# Altium PCB RTL8316_STAND.PcbDoc (part 1 of 4)
Units mm, origin at the board's own origin, x right, y up, seen from the top; angles counter-clockwise.
Board outline 155 x 217 mm, 4 copper layers (Top, Ground, Power, Bottom), stack 1.012 mm thick; 305 components, 396 nets, 1247 pads, 345 vias.
Unrouted connection lines stored in the file: 59.
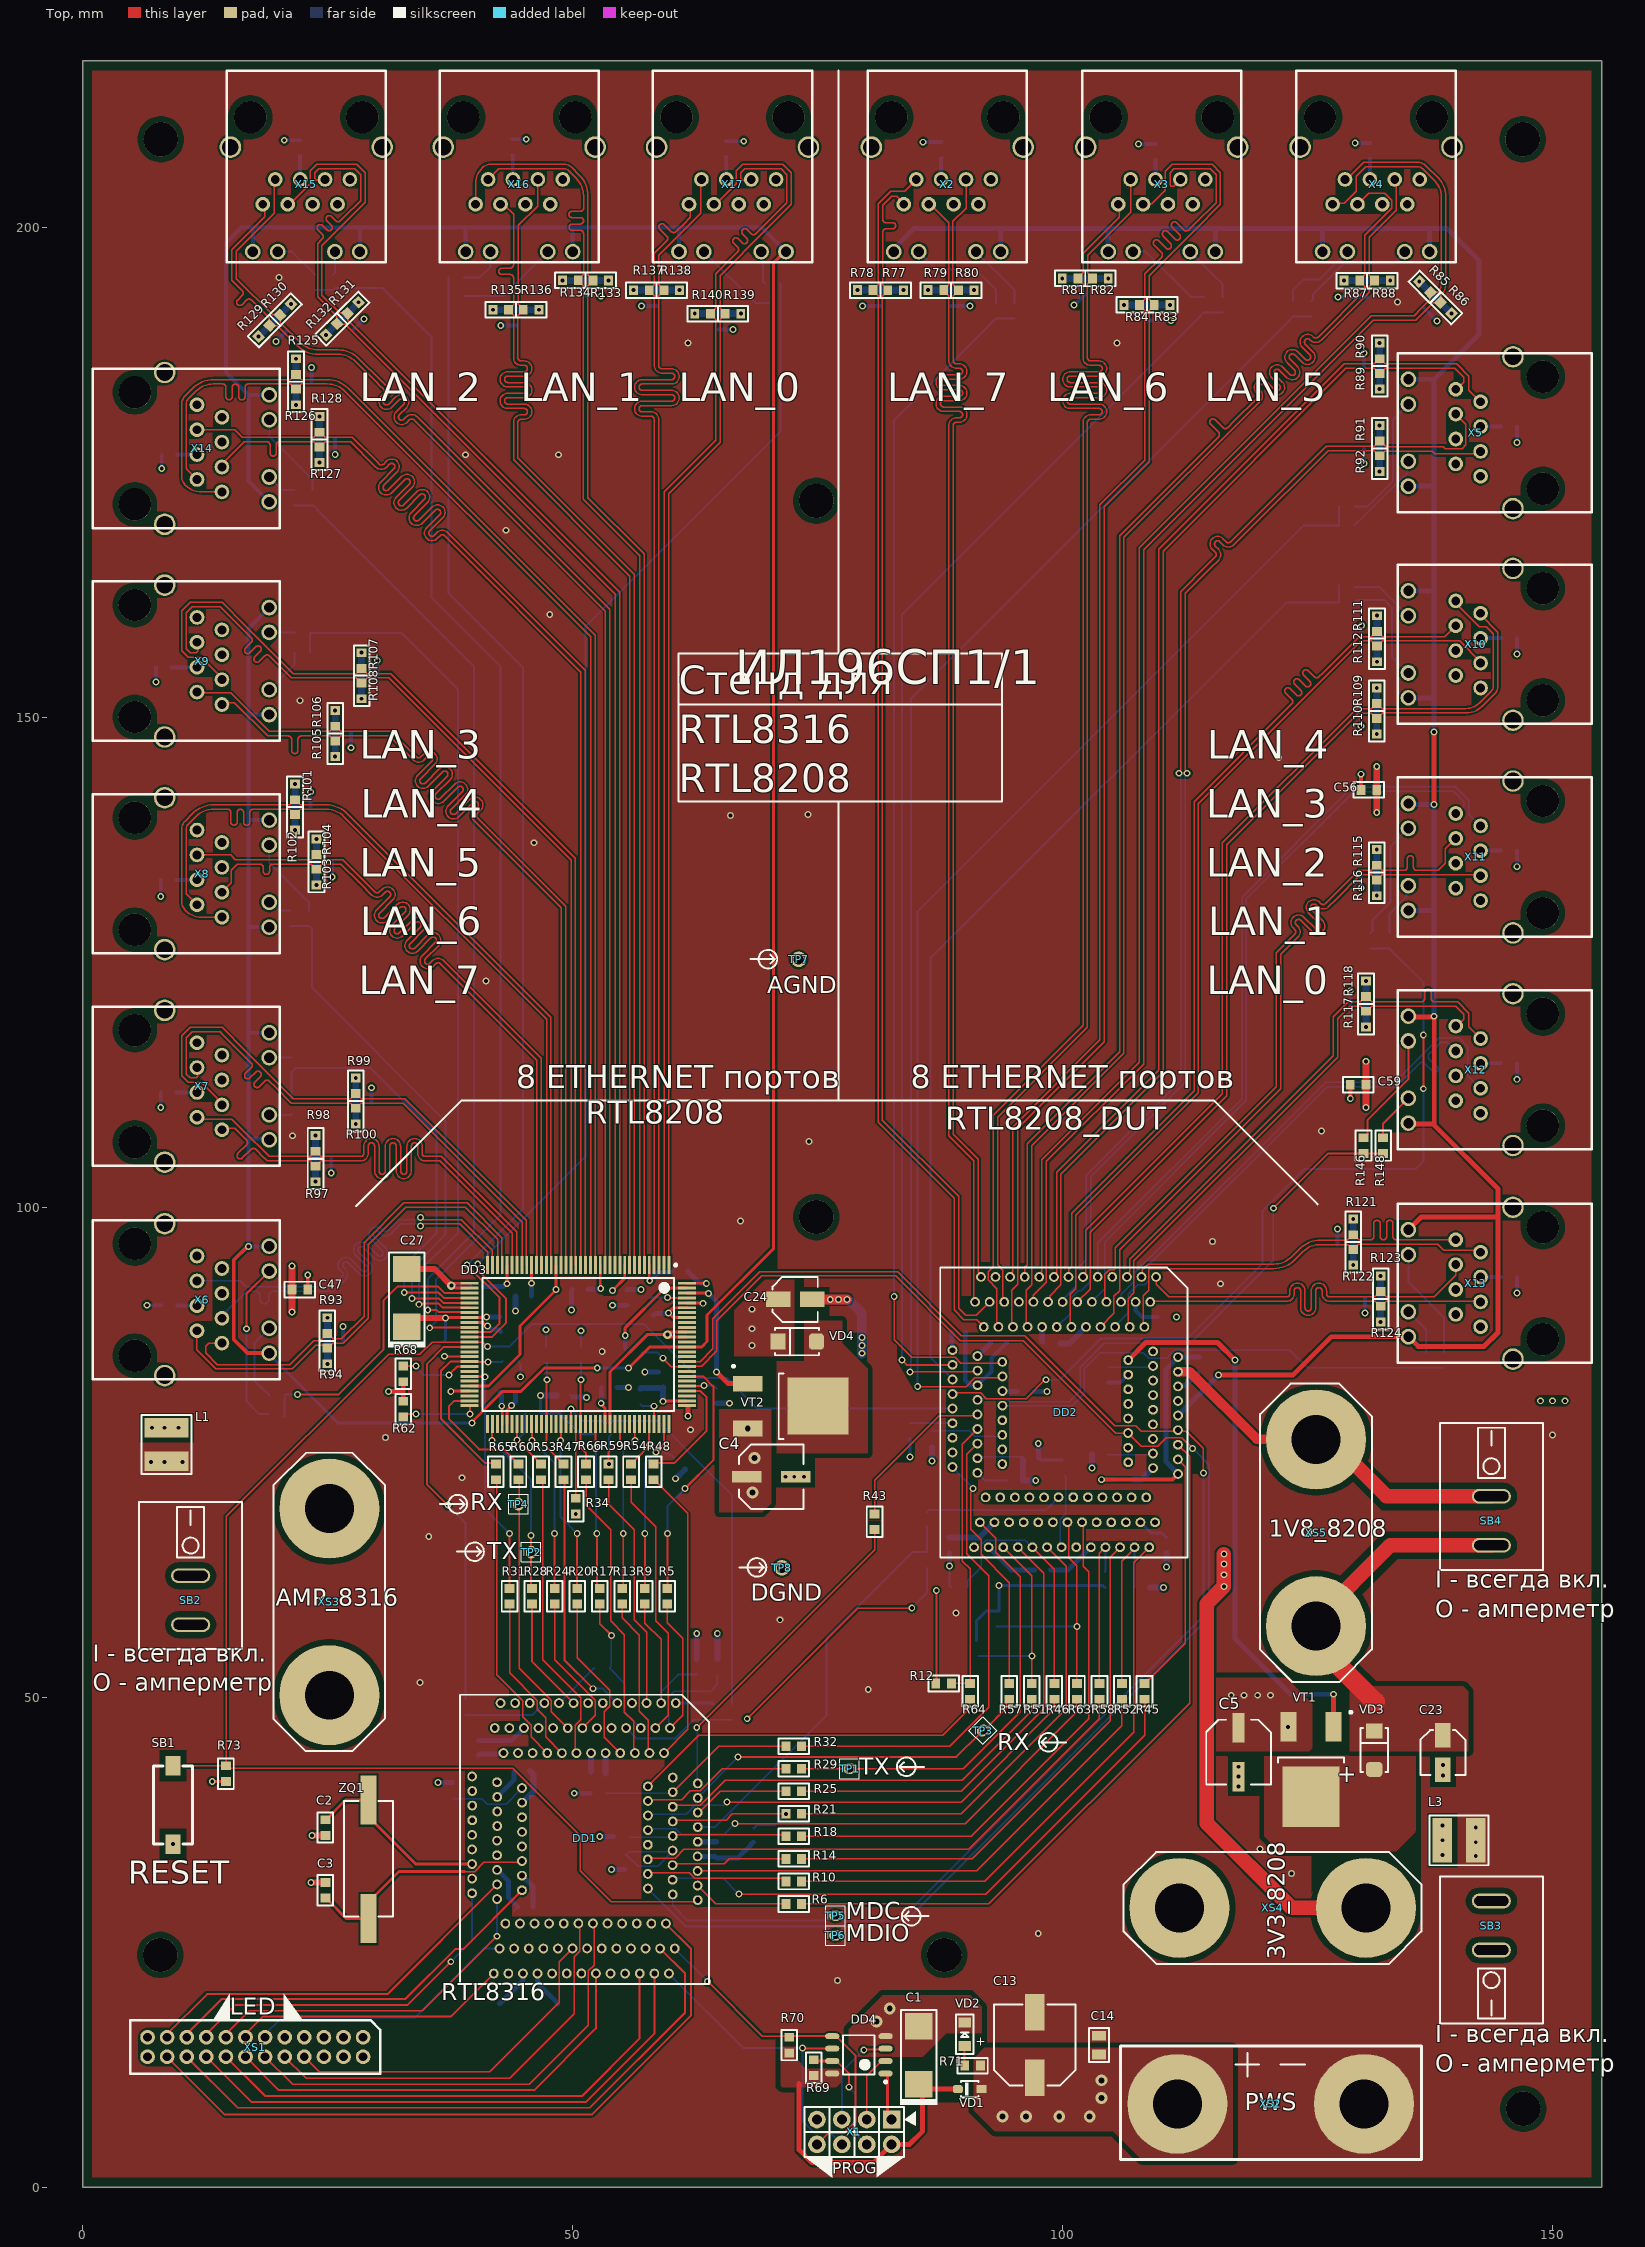
[diagram p0: Top view]
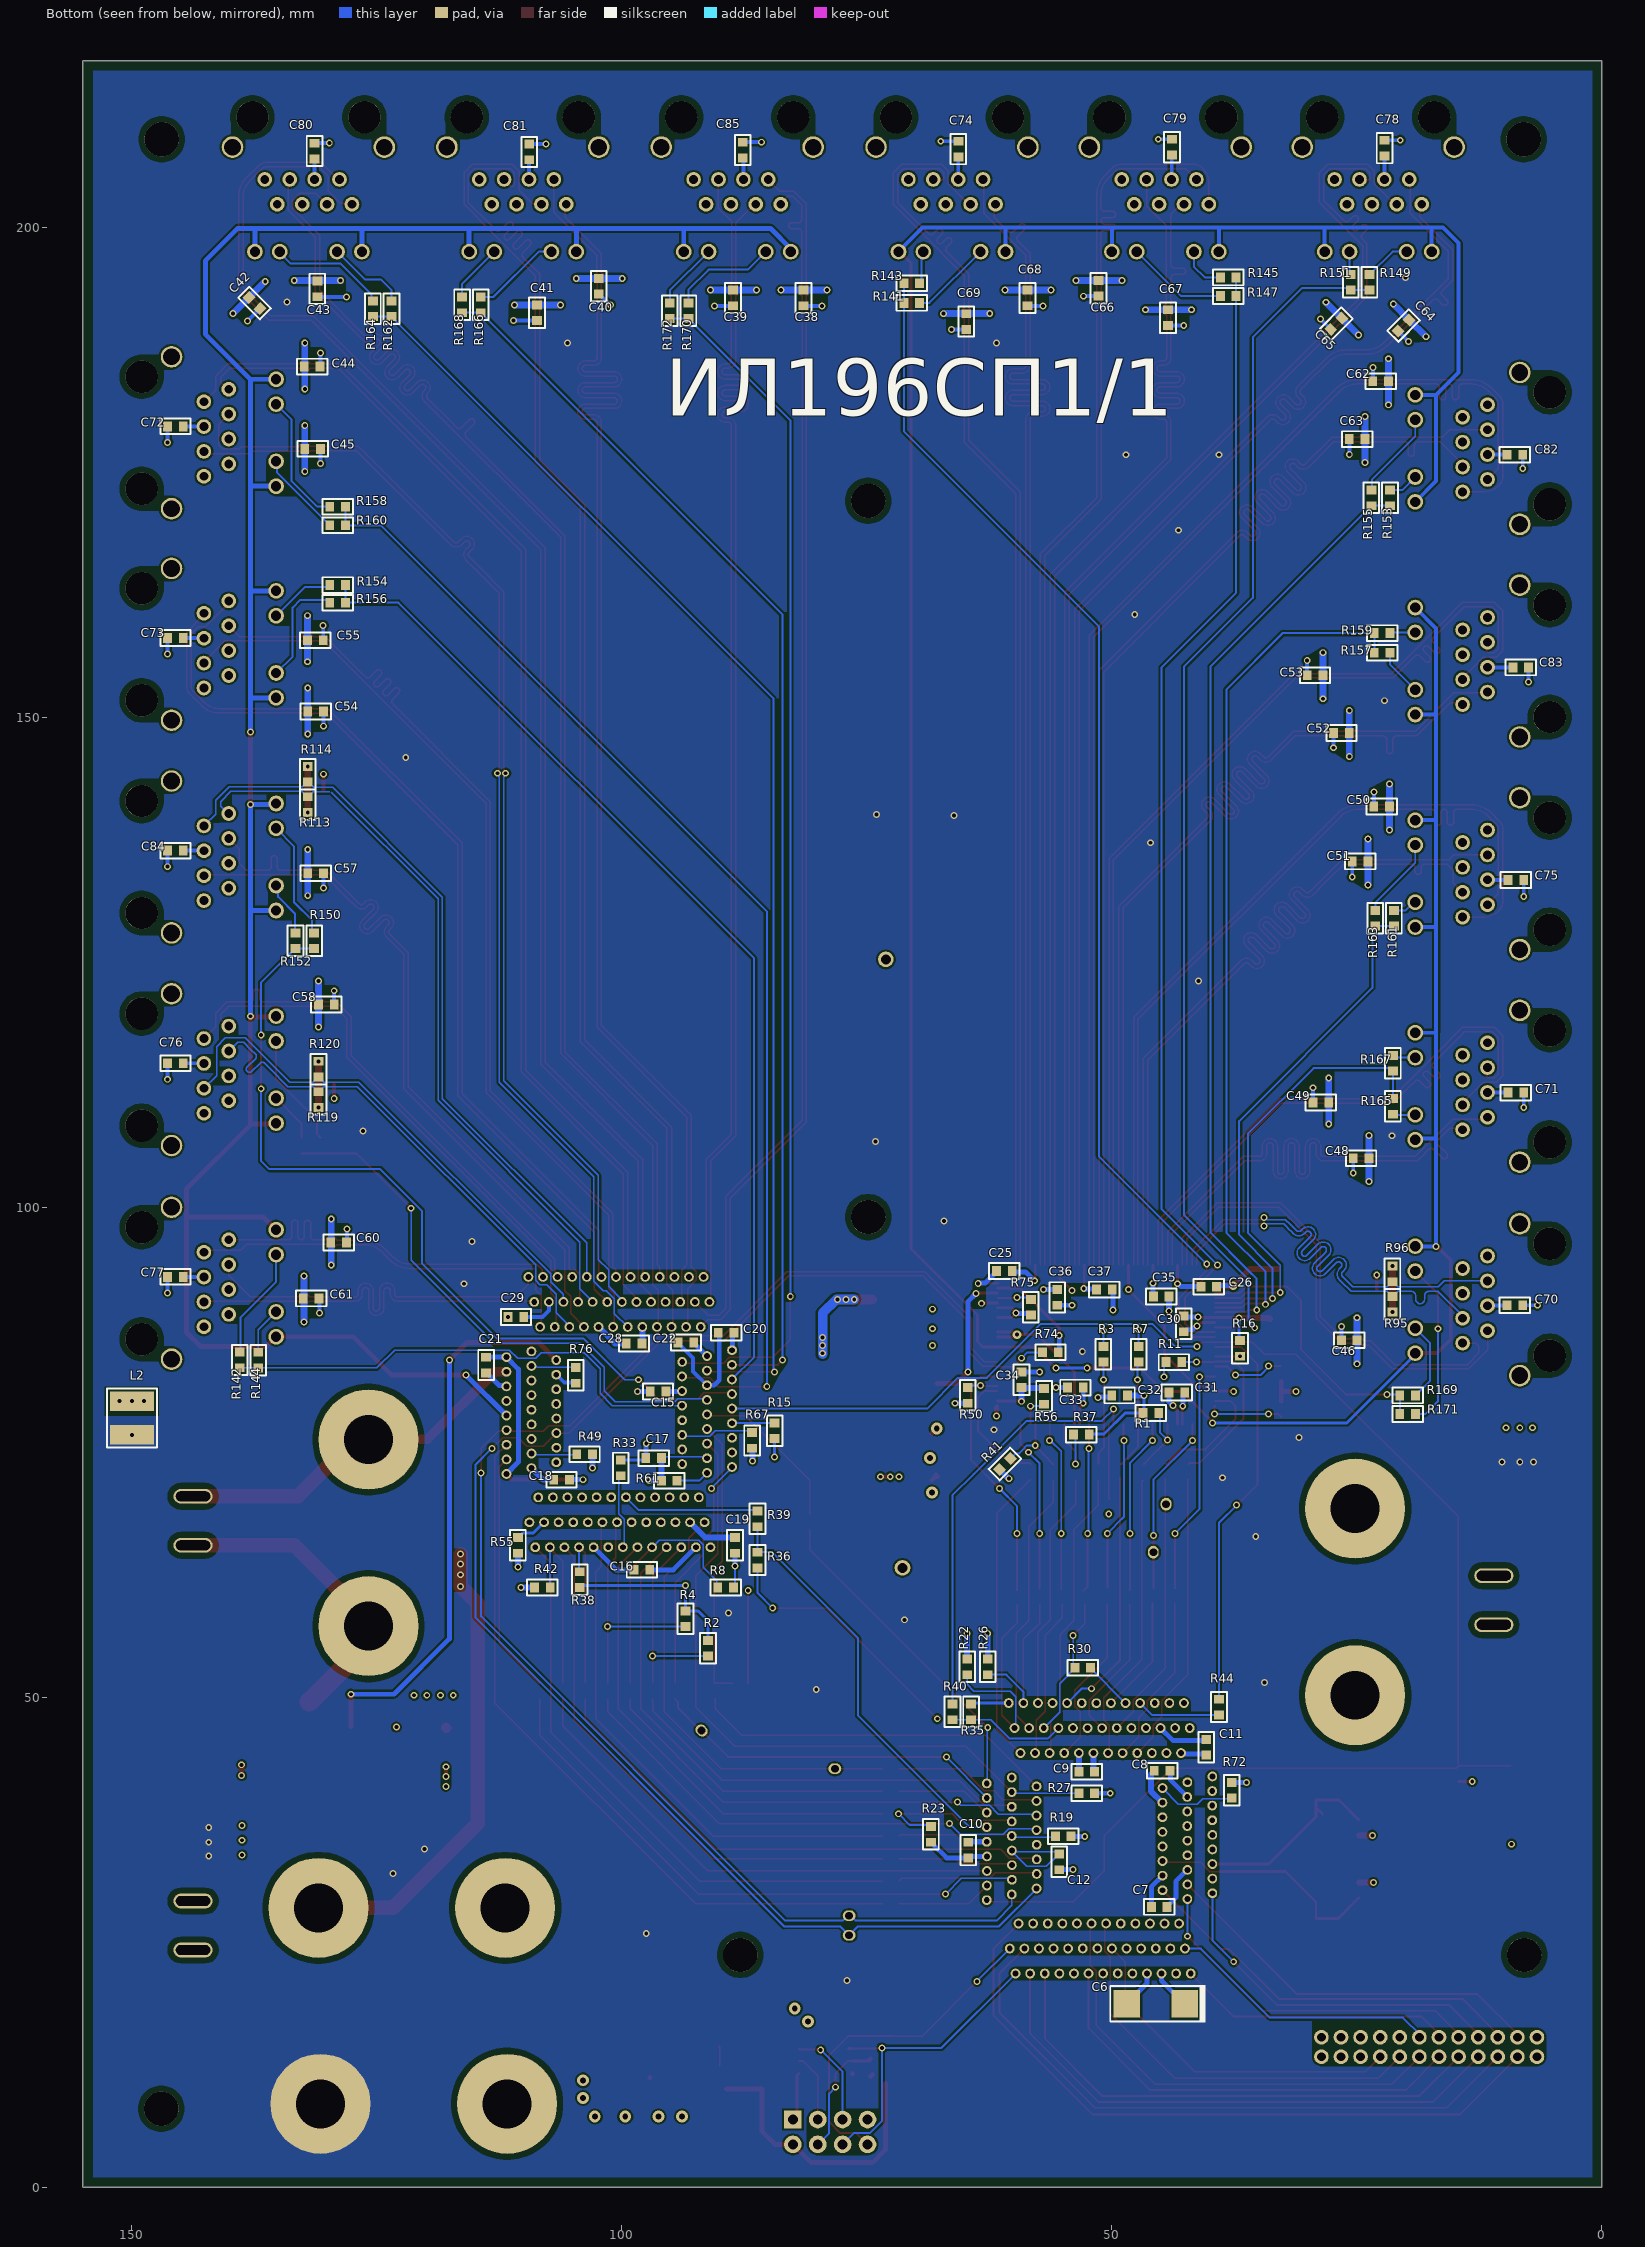
[diagram p1: Bottom view, seen from below]
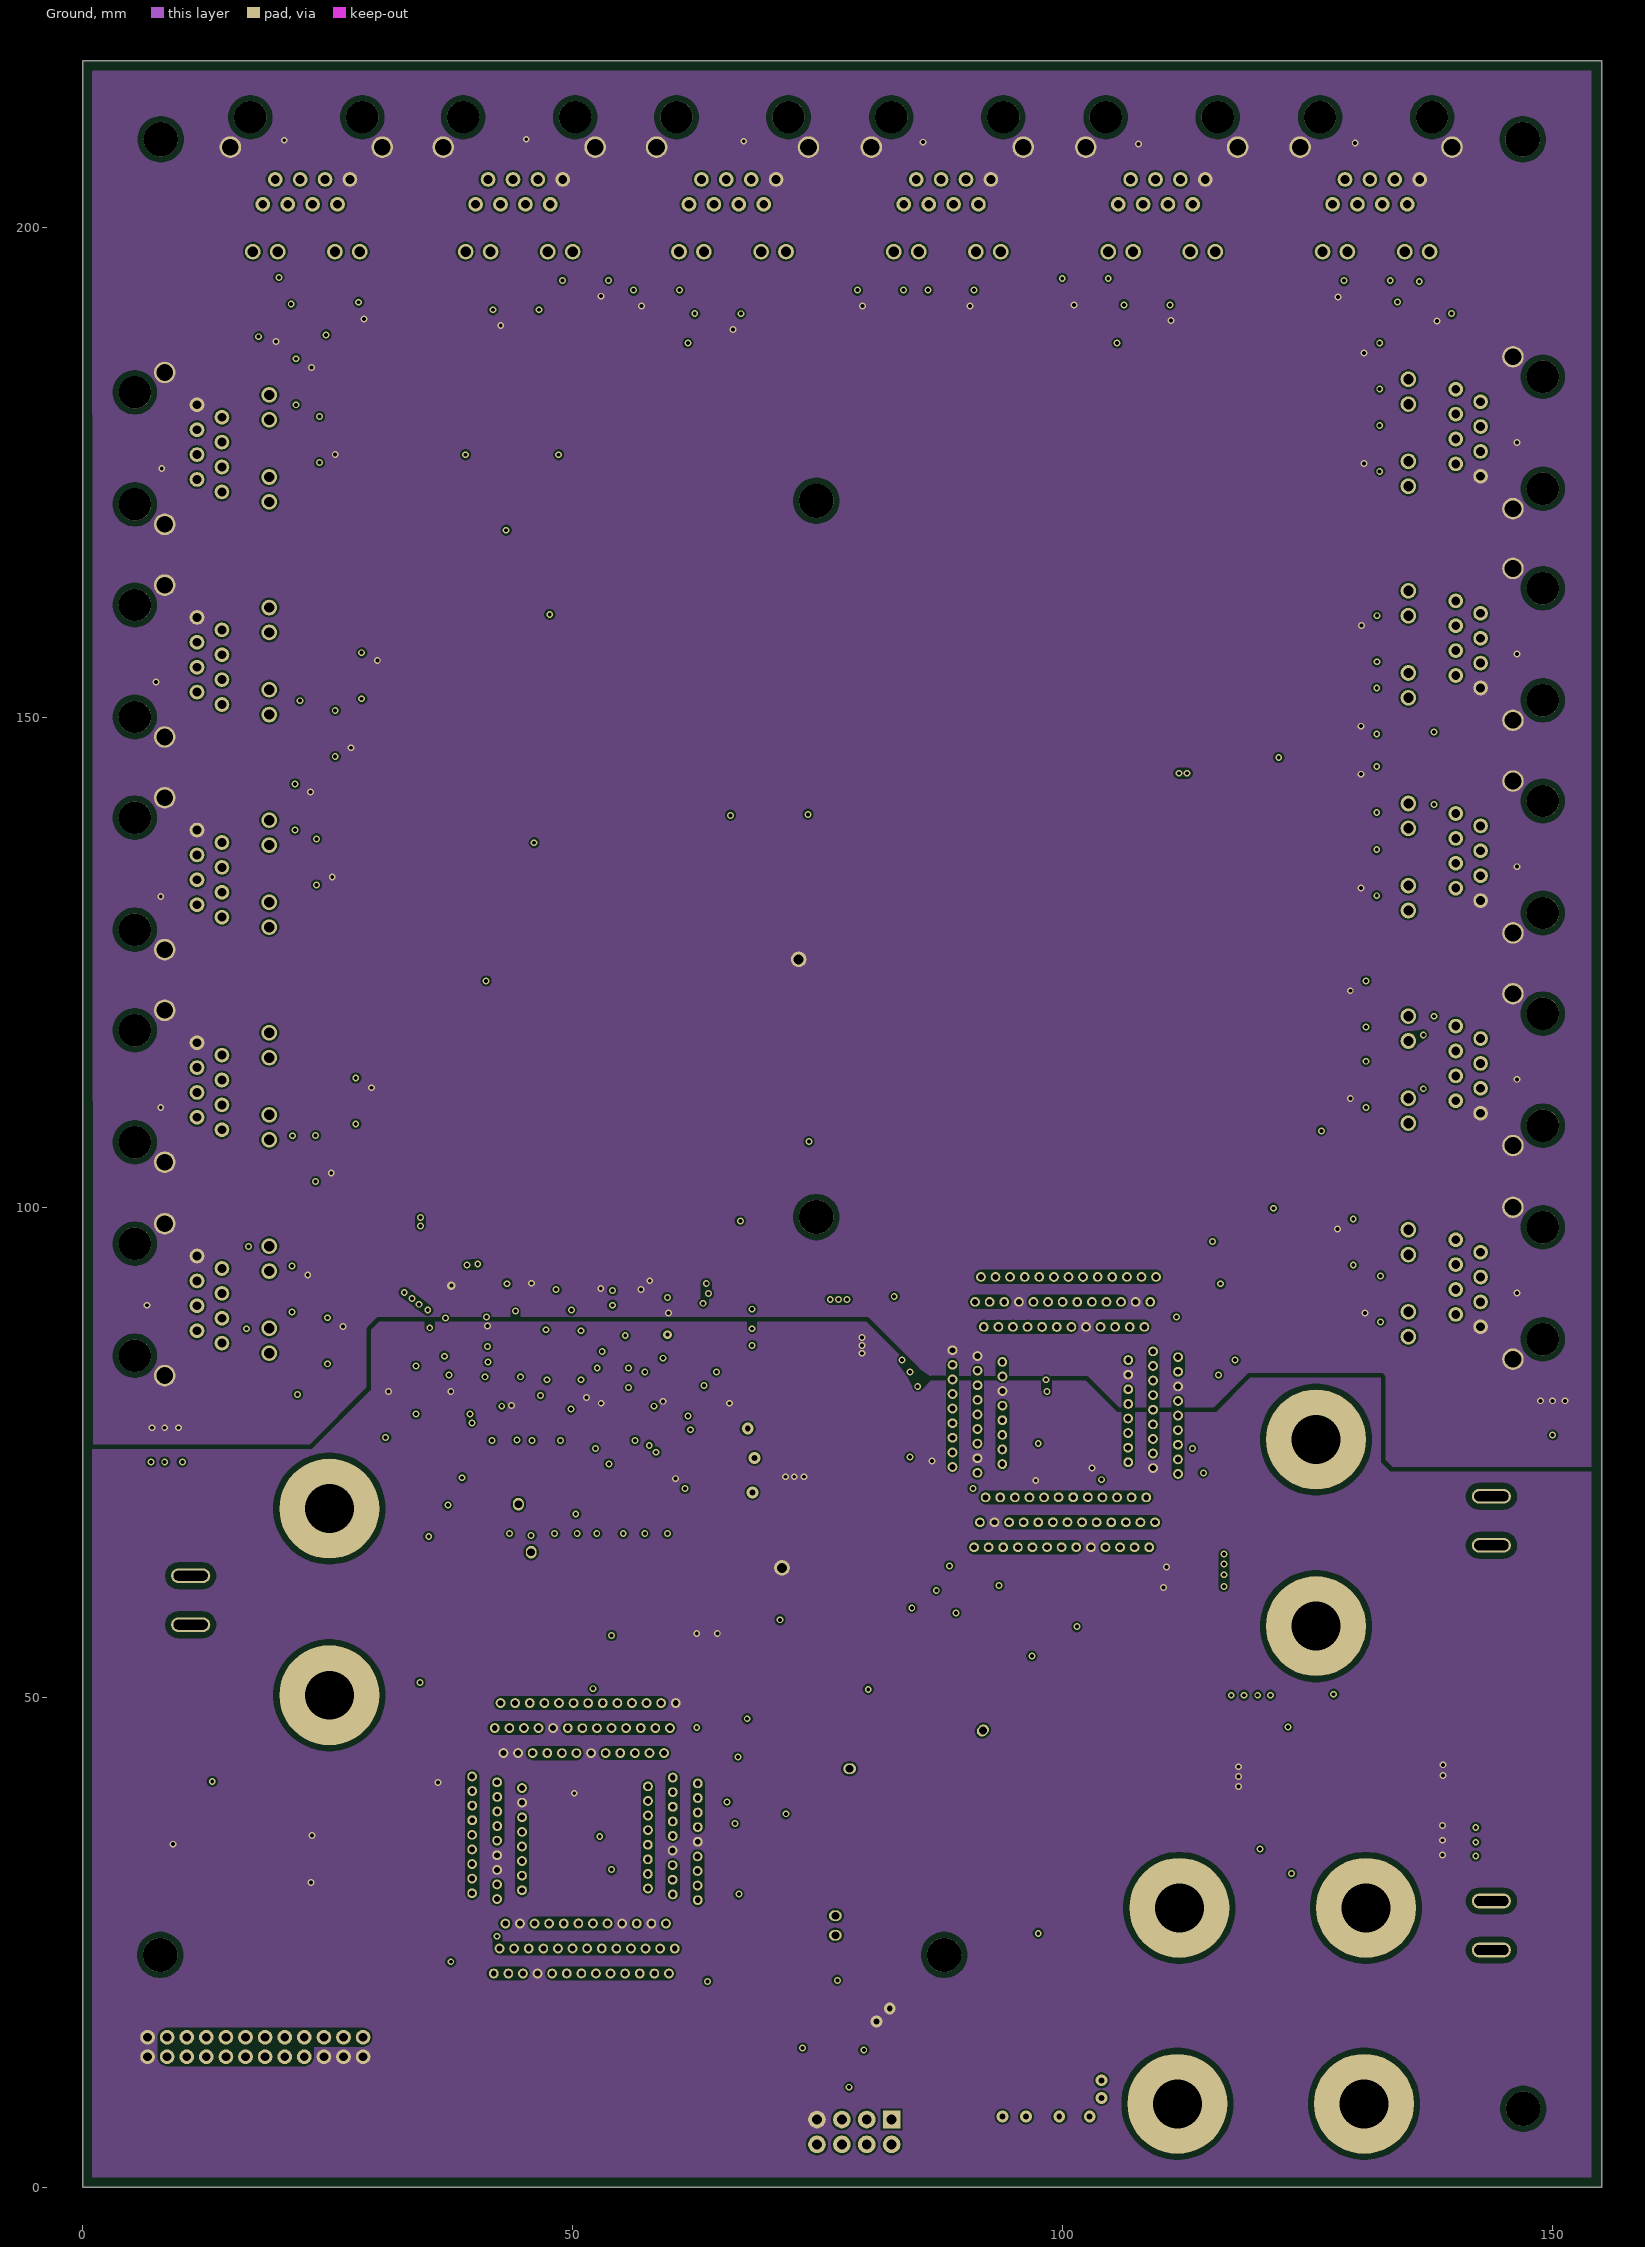
[diagram p2: Ground]
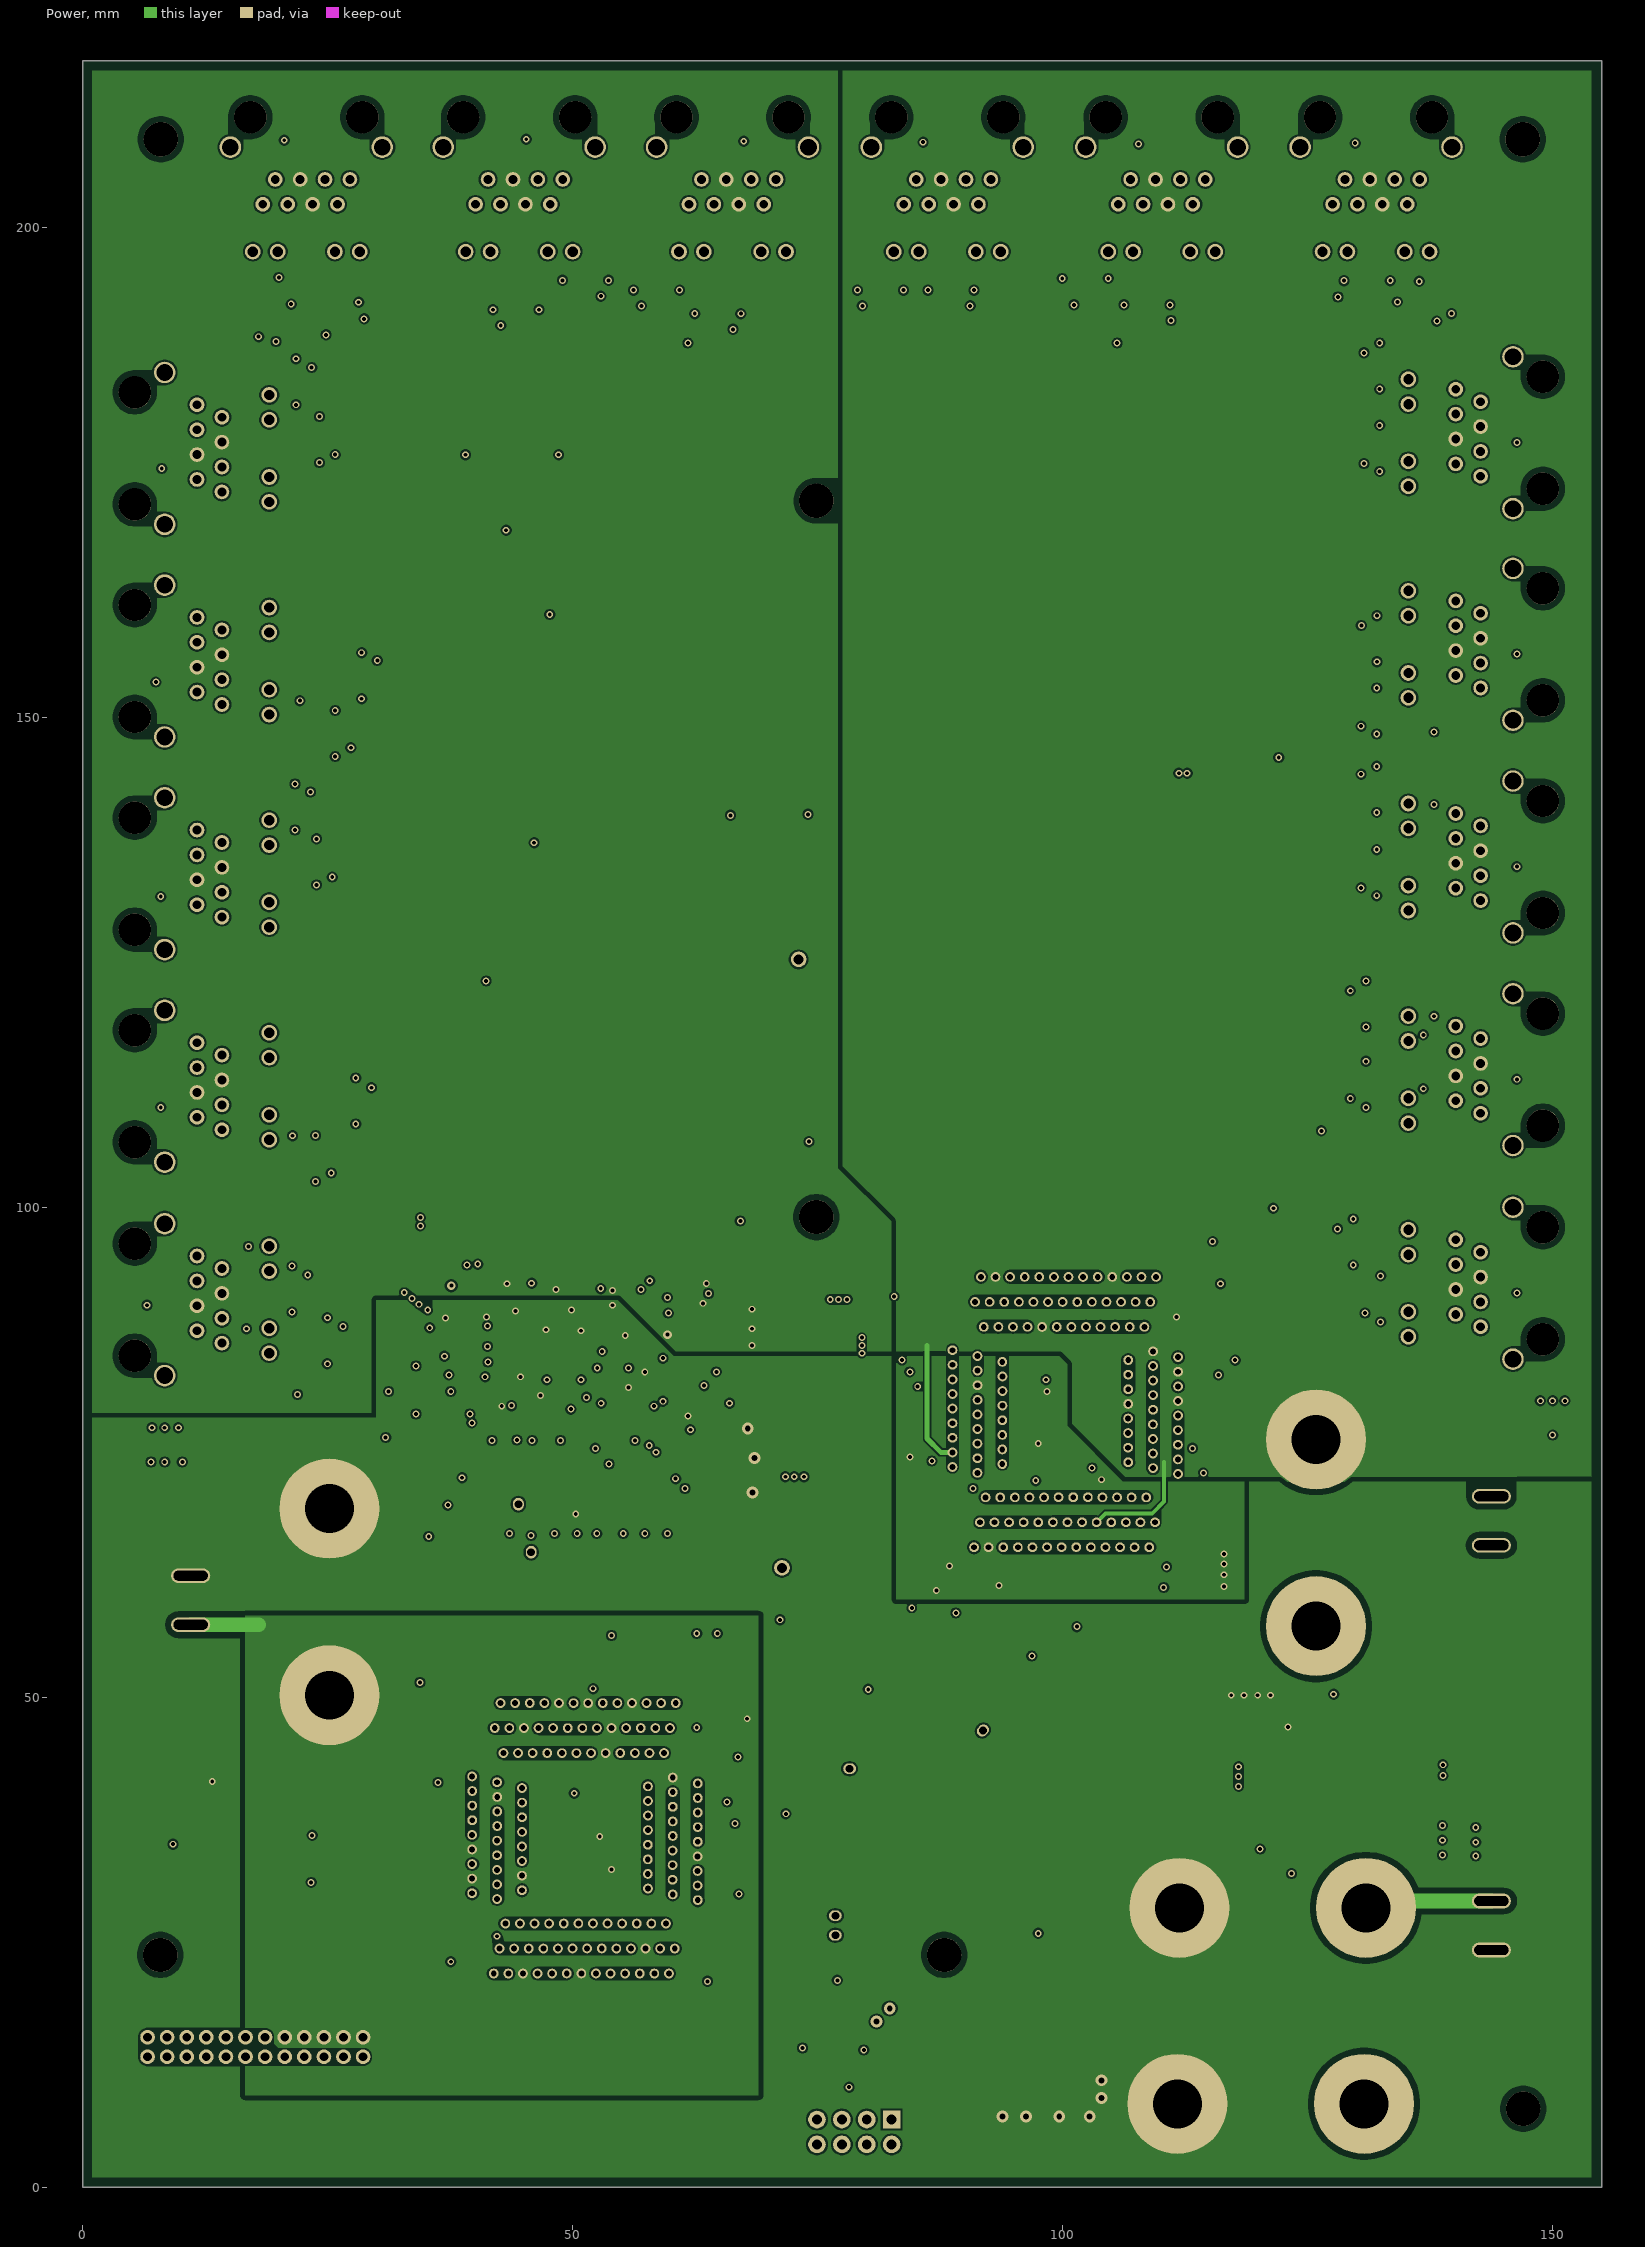
[diagram p3: Power]

## Layer stack, top to bottom
Top Solder: solder mask 0.025, Solder Resist, Dk 4
Top: signal copper 0.018
Dielectric 2: prepreg 0.115, FR4 PR, Dk 4.2
Ground: signal copper 0.018
Dielectric 1: core 0.71, FR4 Tg150, Dk 4.6
Power: signal copper 0.018
Dielectric 3: prepreg 0.115, FR4 PR, Dk 4.2
Bottom: signal copper 0.018
Bottom Solder: solder mask 0.025, Solder Resist, Dk 4

## Board outline
0,0 0,217 155,217 155,0

## Design rules (kind name [scope] priority, off if disabled: settings)
Clearance Clearance_2 [InComponent('C27') or InComponent('C1') or InComponent('C5') or InComponent('C4') or InComponent('C23') OR InComponent('C24') or InComponent('L*')] p1: gap=0.15 ignorepadtopadclearanceinfootprint=FALSE except(0.2: Arc-Arc Arc-Track Track-Track; 0.5: Arc-Fill Arc-Poly Arc-Region Track-Fill Track-Poly Track-Region SMDPad-Fill SMDPad-Poly SMDPad-Region THPad-Fill THPad-Poly THPad-Region Via-Fill Via-Poly Via-Region Fill-Fill Fill-Poly Fill-Region Poly-Poly Poly-Region Region-Region)
Clearance Clearance_1 [(Not (InAnyNet)) And (IsPadHoleValid or IsVia) And Not IsComponent OR InComponent('XS2') or InComponent('XS3') or InComponent('XS4') or InComponent('XS5') or InComponent('XS6') OR InComponent('SB*')] p2: gap=0.6 ignorepadtopadclearanceinfootprint=FALSE
Clearance [All] p3: gap=0.15 ignorepadtopadclearanceinfootprint=FALSE except(0.2: Arc-Arc Arc-Track Arc-Fill Arc-Poly Arc-Region Track-Track Track-Fill Track-Poly Track-Region SMDPad-Fill SMDPad-Poly SMDPad-Region THPad-Fill THPad-Poly THPad-Region Via-Fill Via-Poly Via-Region; 0.5: Fill-Fill Fill-Poly Fill-Region Poly-Poly Poly-Region Region-Region)
ComponentClearance [All] p1: gap=0 collisioncheckmode=3 verticalgap=0 showdistances=FALSE
DiffPairsRouting [All] p1: maxlimit=0.6 minlimit=0.3 mostfreqgap=0.4 toplayer_minwidth=0.15 toplayer_maxwidth=0.6 toplayer_prefwidth=0.2 midlayer1_minwidth=0.15 midlayer1_maxwidth=0.6 midlayer1_prefwidth=0.2 midlayer2_minwidth=0.15 midlayer2_maxwidth=0.6 midlayer2_prefwidth=0.2 bottomlayer_minwidth=0.15 bottomlayer_maxwidth=0.6 bottomlayer_prefwidth=0.2 maxuncoupledlength=12.7
HoleSize [All] p1: absolutevalues=TRUE maxlimit=6 minlimit=0.025 maxpercent=80.000 minpercent=20.000
MatchedLengths [All] p1: tolerance=1 checknetsindiffpair=TRUE checkdiffpairvsdiffpair=FALSE checkxsignals=FALSE checkothers=FALSE
PolygonConnect PolygonConnect_2 [InComponent('XS*')] p1: connectstyle=Direct reliefconductorwidth=0.254 reliefentries=4 polygonreliefangle="90 Angle" airgapwidth=0.254
PolygonConnect PolygonConnect_1 [IsVia] p2: connectstyle=Direct reliefconductorwidth=0.254 reliefentries=4 polygonreliefangle="90 Angle" airgapwidth=0.254
PolygonConnect [All] p3: connectstyle=Direct reliefconductorwidth=0.5 reliefentries=4 polygonreliefangle="90 Angle" airgapwidth=0.254
RoutingVias [All] p1: holewidth=0.4 width=0.7 viastyle="Through Hole" minholewidth=0.4 minwidth=0.7 maxholewidth=0.8 maxwidth=1.4
SilkToSilkClearance [All] p1: silktosilkclearance=0
SilkToSolderMaskClearance [IsPad] p1: minsilkscreentomaskgap=0 clearancetoexposedcopper=TRUE
SolderMaskExpansion [All] p1: expansion=0.102 istentingtop=FALSE
Width [All] p1: maxlimit=2 minlimit=0.15 preferedwidth=0.3 toplayer_prefwidth=0.2 midlayer1_minwidth=0.3 midlayer2_minwidth=0.3 bottomlayer_prefwidth=0.2 minimp=50.000000 maximp=50.000000 favimp=50.000000
25 further rules are at their usual default settings.

## Classes and differential pairs
component class RJ45_14: C42 C43 R85 R86 R87 R88 X4
component class RJ45_13: C44 C45 R89 R90 R91 R92 X5
component class RJ45_8: C46 C47 R93 R94 R95 R96 А
component class RJ45_15: C40 C41 R81 R82 R83 R84 X3
component class RJ45_7: C48 C49 R97 R98 R99 R100 X7
component class RJ45_6: C50 C51 R101 R102 R103 R104 X8
component class RJ45_5: C52 C53 R105 R106 R107 R108 X9
net class LED[0..15]: LED0 LED1 LED2 LED3 LED4 LED5 LED6 LED7 LED8 LED9 LED10 LED11 LED12 LED13 LED14 LED15
component class RJ45_16: C38 C39 R77 R78 R79 R80 X2
component class RJ45_1: C68 C69 R137 R138 R139 R140 X17
component class RJ45_11: C56 C57 R113 R114 R115 R116 X11
component class RJ45_10: C58 C59 R117 R118 R119 R120 X12
component class RJ45_12: C54 C55 R109 R110 R111 R112 X10
component class RJ45_9: C60 C61 F R121 R122 R123 R124 X13
component class RJ45_4: C62 C63 R125 R126 R127 R128 X14
component class RJ45_3: C64 C65 R129 R130 R131 R132 X15
component class RJ45_2: C66 C67 R133 R134 R135 R136 X16
channel class RJ-45_CONN: 1 2 3 4 5 6 7 8 9 10 11 12 13 14 15 16
component class U_RJ-45_OUTPUT: C70 C71 C72 C73 C74 C75 C76 C77 C78 C79 C80 C81 C82 C83 C84 C85 DD2 DD3 R141 R142 R143 R144 R145 R146 R147 R148 R149 R150 R151 R152 R153 R154 R155 R156 R157 R158 R159 R160 R161 R162 R163 R164 R165 R166 R167 R168 R169 R170 R171 R172
component class U_LED_RESET_XCO: C1 C2 C3 DD4 R69 R70 R71 R72 R73 R74 SB1 TP5 TP6 VD1 VD2 X1 XS1 ZQ1
component class U_INTERFACE: DD1 R1 R2 R3 R4 R5 R6 R7 R8 R9 R10 R11 R12 R13 R14 R15 R16 R17 R18 R19 R20 R21 R22 R23 R24 R25 R26 R27 R28 R29 R30 R31 R32 R33 R34 R35 R36 R37 R38 R39 R40 R41 R42 R43 R44 R45 R46 R47 R48 R49 R50 R51 R52 R53 R54 R55 R56 R57 R58 R59 R60 R61 R62 R63 R64 R65 R66 R67 R68 TP1 TP2 TP3 TP4
component class POWER_TOP: C4 C5 C6 C7 C8 C9 C10 C11 C12 C13 C14 C15 C16 C17 C18 C19 C20 C21 C22 C23 C24 C25 C26 C27 C28 C29 C30 C31 C32 C33 C34 C35 C36 C37 L1 L2 L3 R75 R76 SB2 SB3 SB4 TP7 TP8 VD3 VD4 VT1 VT2 XS2 XS3 XS4 XS5
differential pair TX15: +TX15_P -TX15_N
differential pair TX14: +TX14_P -TX14_N
differential pair TX13: +TX13_P -TX13_N
differential pair TX12: +TX12_P -TX12_N
differential pair TX11: +TX11_P -TX11_N
differential pair TX10: +TX10_P -TX10_N
differential pair TX9: +TX9_P -TX9_N
differential pair TX8: +TX8_P -TX8_N
differential pair TX7: +TX7_P -TX7_N
differential pair TX6: +TX6_P -TX6_N
differential pair TX5: +TX5_P -TX5_N
differential pair TX4: +TX4_P -TX4_N
differential pair TX3: +TX3_P -TX3_N
differential pair TX2: +TX2_P -TX2_N
differential pair TX1: +TX1_P -TX1_N
differential pair TX0: +TX0_P -TX0_N
differential pair RX15: +RX15_P -RX15_N
differential pair RX14: +RX14_P -RX14_N
differential pair RX13: +RX13_P -RX13_N
differential pair RX12: +RX12_P -RX12_N
differential pair RX11: +RX11_P -RX11_N
differential pair RX10: +RX10_P -RX10_N
differential pair RX9: +RX9_P -RX9_N
differential pair RX8: +RX8_P -RX8_N
differential pair RX7: +RX7_P -RX7_N
differential pair RX6: +RX6_P -RX6_N
differential pair RX5: +RX5_P -RX5_N
differential pair RX4: +RX4_P -RX4_N
differential pair RX3: +RX3_P -RX3_N
differential pair RX2: +RX2_P -RX2_N
differential pair RX1: +RX1_P -RX1_N
differential pair RX0: +RX0_P -RX0_N

## Components (designator, comment, footprint, x,y, rotation, side; value= is the part's Value field where it differs from the comment)
C1 "10 мкФ" "TECAP_type C" 85.3,10.5 r90 top (schematic designator C)
C2 "15 пФ" C0603 24.75,36.7 r270 top (schematic designator C)
C3 "15 пФ" C0603 24.75,30.3 r90 top (schematic designator C)
C4 "47 мкФ,16 В" C_alumin_D=6.3mm 70.25,72.5 r0 top (schematic designator C82)
C5 "47 мкФ,16 В" C_alumin_D=6.3mm 117.95,44.4 r270 top (schematic designator C)
C6 "10 мкФ" "TECAP_type C" 42.55,18.7 r0 bottom (schematic designator C)
C7 "0,1 мкФ" C0603 45.15,28.6 r180 bottom (schematic designator C)
C8 "0,1 мкФ" C0603 44.85,42.5 r0 bottom (schematic designator C)
C9 "0,1 мкФ" C0603 52.55,42.4 r180 bottom (schematic designator C)
C10 "0,1 мкФ" C0603 64.65,34.4 r90 bottom (schematic designator C)
C11 "0,1 мкФ" C0603 40.35,44.9 r270 bottom (schematic designator C)
C12 "0,1 мкФ" C0603 55.35,33.2 r90 bottom (schematic designator C)
C13 "470 мкФ" C_alumin_8x10mm 97.15,14.5 r90 top (schematic designator C)
C14 "10 мкФ" C0805 103.7,14.5 r90 top (schematic designator C)
C15 "0,1 мкФ" C0603 96.3,81.2 r180 bottom (schematic designator C)
C16 "0,1 мкФ" C0603 97.945,63 r0 bottom (schematic designator C)
C17 "0,1 мкФ" C0603 96.75,74.4 r180 bottom (schematic designator C)
C18 "0,1 мкФ" C0603 106.15,72.2 r0 bottom (schematic designator C)
C19 "0,1 мкФ" C0603 88.45,65.5 r90 bottom (schematic designator C)
C20 "0,1 мкФ" C0603 89.35,87.2 r180 bottom (schematic designator C)
C21 "0,1 мкФ" C0603 113.85,83.9 r270 bottom (schematic designator C)
C22 "0,1 мкФ" C0603 93.45,86.2 r180 bottom (schematic designator C)
C23 "10 мкФ" C_alumin_D=4mm 138.8,44.35 r270 top (schematic designator C)
C24 "10 мкФ" C_alumin_D=4mm 72.7,90.6 r0 top (schematic designator C)
C25 "0,1 мкФ" C0603 60.95,93.5 r180 bottom (schematic designator C)
C26 "0,1 мкФ" C0603 40.1,91.9 r180 bottom (schematic designator C)
C27 "10 мкФ" "TECAP_type C" 33.05,87.8 r90 top (schematic designator C)
C28 "0,1 мкФ" C0603 98.75,86.1 r0 bottom (schematic designator C)
C29 "0,1 мкФ" C0603 110.8,88.8 r180 bottom (schematic designator C)
C30 "0,1 мкФ" C0603 42.65,88.1 r270 bottom (schematic designator C)
C31 "0,1 мкФ" C0603 43.35,81.1 r0 bottom (schematic designator C)
C32 "0,1 мкФ" C0603 49.2,80.8 r0 bottom (schematic designator C)
C33 "0,1 мкФ" C0603 53.7,81.6 r180 bottom (schematic designator C)
C34 "0,1 мкФ" C0603 59.2,82.4 r270 bottom (schematic designator C)
C35 "0,1 мкФ" C0603 44.95,90.9 r0 bottom (schematic designator C)
C36 "0,1 мкФ" C0603 55.55,90.8 r90 bottom (schematic designator C)
C37 "0,1 мкФ" C0603 50.75,91.6 r0 bottom (schematic designator C)
C38 "0,1 мкФ" C0603 81.45,192.8 r270 bottom (schematic designator C)
C39 "0,1 мкФ" C0603 88.65,192.8 r270 bottom (schematic designator C)
C40 "0,1 мкФ" C0603 102.35,194 r270 bottom (schematic designator C)
C41 "0,1 мкФ" C0603 108.65,191.3 r270 bottom (schematic designator C)
C42 "0,1 мкФ" C0603 137.475,192.273 r225 bottom (schematic designator C)
C43 "0,1 мкФ" C0603 131.068,193.722 r270 bottom (schematic designator C)
C44 "0,1 мкФ" C0603 131.6,185.8 r180 bottom (schematic designator C)
C45 "0,1 мкФ" C0603 131.55,177.4 r180 bottom (schematic designator C)
C46 "0,1 мкФ" C0603 25.75,86.425 r0 bottom (schematic designator C)
C47 "0,1 мкФ" C0603 22.15,91.6 r0 top (schematic designator C)
C48 "0,1 мкФ" C0603 24.55,105 r0 bottom (schematic designator C)
C49 "0,1 мкФ" C0603 28.65,110.7 r0 bottom (schematic designator C)
C50 "0,1 мкФ" C0603 22.45,140.9 r0 bottom (schematic designator C)
C51 "0,1 мкФ" C0603 24.65,135.3 r0 bottom (schematic designator C)
C52 "0,1 мкФ" C0603 26.55,148.4 r0 bottom (schematic designator C)
C53 "0,1 мкФ" C0603 29.25,154.3 r0 bottom (schematic designator C)
C54 "0,1 мкФ" C0603 131.25,150.6 r180 bottom (schematic designator C)
C55 "0,1 мкФ" C0603 131.275,157.875 r180 bottom (schematic designator C)
C56 "0,1 мкФ" C0603 131.25,142.6 r180 top (schematic designator C)
C57 "0,1 мкФ" C0603 131.25,134.1 r180 bottom (schematic designator C)
C58 "0,1 мкФ" C0603 130.15,120.7 r180 bottom (schematic designator C)
C59 "0,1 мкФ" C0603 130.15,112.5 r180 top (schematic designator C)
C60 "0,1 мкФ" C0603 128.9,96.4 r180 bottom (schematic designator C)
C61 "0,1 мкФ" C0603 131.7,90.7 r180 bottom (schematic designator C)
C62 "0,1 мкФ" C0603 22.55,184.3 r0 bottom (schematic designator C)
C63 "0,1 мкФ" C0603 24.95,178.4 r0 bottom (schematic designator C)
C64 "0,1 мкФ" C0603 20.201,189.983 r315 bottom (schematic designator C)
C65 "0,1 мкФ" C0603 27.081,190.173 r315 bottom (schematic designator C)
C66 "0,1 мкФ" C0603 51.35,193.8 r270 bottom (schematic designator C)
C67 "0,1 мкФ" C0603 44.25,190.8 r270 bottom (schematic designator C)
C68 "0,1 мкФ" C0603 58.6,192.8 r270 bottom (schematic designator C)
C69 "0,1 мкФ" C0603 64.85,190.4 r270 bottom (schematic designator C)
C70 "0,1 мкФ" C0603 8.85,90 r180 bottom (schematic designator C)
C71 "0,1 мкФ" C0603 8.75,111.7 r180 bottom (schematic designator C)
C72 "0,1 мкФ" C0603 145.55,179.7 r0 bottom (schematic designator C)
C73 "0,1 мкФ" C0603 145.55,158.1 r0 bottom (schematic designator C)
C74 "0,1 мкФ" C0603 65.65,208 r90 bottom (schematic designator C)
C75 "0,1 мкФ" C0603 8.75,133.4 r180 bottom (schematic designator C)
C76 "0,1 мкФ" C0603 145.55,114.7 r0 bottom (schematic designator C)
C77 "0,1 мкФ" C0603 145.55,92.9 r0 bottom (schematic designator C)
C78 "0,1 мкФ" C0603 22.15,208.1 r90 bottom (schematic designator C)
C79 "0,1 мкФ" C0603 43.85,208.2 r90 bottom (schematic designator C)
C80 "0,1 мкФ" C0603 131.35,207.8 r90 bottom (schematic designator C)
C81 "0,1 мкФ" C0603 109.45,207.7 r90 bottom (schematic designator C)
C82 "0,1 мкФ" C0603 8.85,176.8 r180 bottom (schematic designator C)
C83 "0,1 мкФ" C0603 8.25,155.1 r180 bottom (schematic designator C)
C84 "0,1 мкФ" C0603 145.55,136.4 r0 bottom (schematic designator C)
C85 "0,1 мкФ" C0603 87.65,207.9 r90 bottom (schematic designator C)
DD1 "RTL8316B" QFP-128_(14x20mm)_0.5mm_ZIF 60.49,49.4 r270 top
DD2 "RTL8208B" QFP-128_(14x20mm)_0.5mm_ZIF 109.51,92.9 r270 top (schematic designator DD3)
DD3 "RTL8208B" QFP-128_14x20mm_0.5mm 50.55,86 r180 top locked (schematic designator DD2)
DD4 "AT24C16B" SOIC-8 79.2,13.5 r180 top locked (schematic designator DD)
L1 "2.2 мкГн" CD43_Inductor 8.55,75.8 r270 top (schematic designator L3)
L2 "2.2 мкГн" CD43_Inductor 150,78.5 r270 bottom (schematic designator L)
L3 "2.2 мкГн" CD43_Inductor 140.45,35.4 r180 top locked (schematic designator L)
R1 "10 кОм" R0603 46,79 r180 bottom (schematic designator R)
R2 "10 кОм" R0603 91.2,55 r270 bottom (schematic designator R)
R3 "15 кОм" R0603 50.85,85 r270 bottom (schematic designator R)
R4 "15 кОм" R0603 93.5,58 r270 bottom (schematic designator R)
R5 "33 Ом" R0603 59.65,60.3 r270 top (schematic designator R)
R6 "33 Ом" R0603 72.55,28.9 r180 top (schematic designator R)
R7 "15 кОм" R0603 47.25,85 r270 bottom (schematic designator R)
R8 "15 кОм" R0603 89.4,61.2 r0 bottom (schematic designator R)
R9 "33 Ом" R0603 57.35,60.3 r270 top (schematic designator R)
R10 "33 Ом" R0603 72.55,31.2 r180 top (schematic designator R)
R11 "15 кОм" R0603 43.65,84.2 r180 bottom (schematic designator R)
R12 "15 кОм" R0603 87.85,51.4 r0 top (schematic designator R)
R13 "33 Ом" R0603 55.05,60.3 r270 top (schematic designator R)
R14 "33 Ом" R0603 72.55,33.5 r180 top (schematic designator R)
R15 "15 кОм" R0603 84.4,77.2 r90 bottom (schematic designator R)
R16 "15 кОм" R0603 36.9,85.6 r270 bottom (schematic designator R)
R17 "33 Ом" R0603 52.75,60.3 r270 top (schematic designator R)
R18 "33 Ом" R0603 72.55,35.8 r180 top (schematic designator R)
R19 "15 кОм" R0603 54.95,35.8 r0 bottom (schematic designator R)
R20 "33 Ом" R0603 50.45,60.3 r270 top (schematic designator R)
R21 "33 Ом" R0603 72.55,38.1 r180 top (schematic designator R)
R22 "15 кОм" R0603 64.75,53.1 r270 bottom (schematic designator R)
R23 "15 кОм" R0603 68.45,36 r90 bottom (schematic designator R)
R24 "33 Ом" R0603 48.15,60.3 r270 top (schematic designator R)
R25 "33 Ом" R0603 72.55,40.4 r180 top (schematic designator R)
R26 "15 кОм" R0603 62.65,53.1 r270 bottom (schematic designator R)
R27 "15 кОм" R0603 52.55,40.2 r0 bottom (schematic designator R)
R28 "33 Ом" R0603 45.85,60.3 r270 top (schematic designator R)
R29 "33 Ом" R0603 72.55,42.7 r180 top (schematic designator R)
R30 "15 кОм" R0603 52.95,53 r0 bottom (schematic designator R)
R31 "33 Ом" R0603 43.55,60.3 r270 top (schematic designator R)
R32 "33 Ом" R0603 72.55,45 r180 top (schematic designator R)
R33 "15 кОм" R0603 100.1,73.4 r270 bottom (schematic designator R)
R34 "15 кОм" R0603 50.3,69.5 r90 top (schematic designator R)
R35 "1 кОм" R0603 64.35,48.5 r270 bottom (schematic designator R)
R36 "1 кОм" R0603 86.15,64 r90 bottom (schematic designator R)
R37 "15 кОм" R0603 53.1,76.8 r0 bottom (schematic designator R)
R38 "15 кОм" R0603 104.3,62 r90 bottom (schematic designator R)
R39 "33 Ом" R0603 86.15,68.2 r270 bottom (schematic designator R)
R40 "33 Ом" R0603 66.25,48.5 r270 bottom (schematic designator R)
R41 "15 кОм" R0603 60.9,73.8 r135 bottom (schematic designator R)
R42 "15 кОм" R0603 108.1,61.2 r180 bottom (schematic designator R)
R43 "33 Ом" R0603 80.8,67.9 r270 top (schematic designator R)
R44 "33 Ом" R0603 39.05,49 r270 bottom (schematic designator R)
R45 "33 Ом" R0603 108.35,50.6 r90 top (schematic designator R)
R46 "33 Ом" R0603 99.15,50.6 r90 top (schematic designator R)
R47 "33 Ом" R0603 49.05,73 r90 top (schematic designator R)
R48 "33 Ом" R0603 58.25,73 r90 top (schematic designator R)
R49 "15 кОм" R0603 103.8,74.8 r0 bottom (schematic designator R)
R50 "15 кОм" R0603 64.7,80.8 r90 bottom (schematic designator R)
R51 "33 Ом" R0603 96.85,50.6 r90 top (schematic designator R)
R52 "33 Ом" R0603 106.05,50.6 r90 top (schematic designator R)
R53 "33 Ом" R0603 46.75,73 r90 top (schematic designator R)
R54 "33 Ом" R0603 55.95,73 r90 top (schematic designator R)
R55 "15 кОм" R0603 110.6,65.5 r90 bottom (schematic designator R)
R56 "15 кОм" R0603 56.9,80.7 r270 bottom (schematic designator R)
R57 "33 Ом" R0603 94.55,50.6 r90 top (schematic designator R)
R58 "33 Ом" R0603 103.75,50.6 r90 top (schematic designator R)
R59 "33 Ом" R0603 53.65,73 r90 top (schematic designator R)
R60 "33 Ом" R0603 44.45,73 r90 top (schematic designator R)
R61 "15 кОм" R0603 95.15,72.1 r180 bottom (schematic designator R)
R62 "15 кОм" R0603 32.7,79.4 r270 top (schematic designator R)
R63 "33 Ом" R0603 101.45,50.6 r90 top (schematic designator R)
R64 "33 Ом" R0603 90.55,50.6 r90 top (schematic designator R)
R65 "33 Ом" R0603 42.15,73 r90 top (schematic designator R)
R66 "33 Ом" R0603 51.35,73 r90 top (schematic designator R)
R67 "15 кОм" R0603 86.7,76.2 r90 bottom (schematic designator R)
R68 "15 кОм" R0603 32.7,83 r90 top (schematic designator R)
R69 "10 кОм" R0603 74.6,12.2 r270 top (schematic designator R)
R70 "1,5 кОм" R0603 72.1,14.5 r270 top (schematic designator R)
R71 "1 кОм" R0603 90.8,12.4 r0 top (schematic designator R)
R72 "4,7 кОм" R0603 37.75,40.5 r90 bottom (schematic designator R)
R73 "510 Ом" R0603 14.6,42.2 r270 top (schematic designator R)
R74 "1,5 кОм" R0603 56.25,85.2 r180 bottom (schematic designator R)
R75 "2 кОм, 1%" R0603 58.25,89.8 r90 bottom (schematic designator R)
R76 "2 кОм, 1%" R0603 104.7,82.85 r90 bottom (schematic designator R)
R77 "49,9 Ом, 1%" R0603 82.95,193.6 r0 top (schematic designator R)
R78 "49,9 Ом, 1%" R0603 79.85,193.601 r180 top (schematic designator R)
R79 "49,9 Ом, 1%" R0603 87.05,193.601 r180 top (schematic designator R)
R80 "49,9 Ом, 1%" R0603 90.15,193.6 r0 top (schematic designator R)
R81 "49,9 Ом, 1%" R0603 100.75,194.801 r180 top (schematic designator R)
R82 "49,9 Ом, 1%" R0603 103.85,194.8 r0 top (schematic designator R)
R83 "49,9 Ом, 1%" R0603 110.15,192.1 r0 top (schematic designator R)
R84 "49,9 Ом, 1%" R0603 107.05,192.1 r180 top (schematic designator R)
R85 "49,9 Ом, 1%" R0603 136.953,193.935 r135 top (schematic designator R)
R86 "49,9 Ом, 1%" R0603 139.109,191.77 r315 top (schematic designator R)
R87 "49,9 Ом, 1%" R0603 129.512,194.571 r180 top (schematic designator R)
R88 "49,9 Ом, 1%" R0603 132.624,194.571 r0 top (schematic designator R)
R89 "49,9 Ом, 1%" R0603 132.35,184.3 r270 top (schematic designator R)
R90 "49,9 Ом, 1%" R0603 132.35,187.4 r90 top (schematic designator R)
R91 "49,9 Ом, 1%" R0603 132.351,179 r90 top (schematic designator R)
R92 "49,9 Ом, 1%" R0603 132.35,175.9 r270 top (schematic designator R)
R93 "49,9 Ом, 1%" R0603 24.95,87.925 r90 top (schematic designator R)
R94 "49,9 Ом, 1%" R0603 24.95,84.825 r270 top (schematic designator R)
R95 "49,9 Ом, 1%" R0603 21.35,90.1 r270 bottom (schematic designator R)
R96 "49,9 Ом, 1%" R0603 21.35,93.2 r90 bottom (schematic designator R)
R97 "49,9 Ом, 1%" R0603 23.75,103.397 r270 top (schematic designator R)
R98 "49,9 Ом, 1%" R0603 23.75,106.525 r90 top (schematic designator R)
R99 "49,9 Ом, 1%" R0603 27.85,112.4 r90 top (schematic designator R)
R100 "49,9 Ом, 1%" R0603 27.85,109.3 r270 top (schematic designator R)
R101 "49,9 Ом, 1%" R0603 21.65,142.4 r90 top (schematic designator R)
R102 "49,9 Ом, 1%" R0603 21.65,139.3 r270 top (schematic designator R)
R103 "49,9 Ом, 1%" R0603 23.85,133.7 r270 top (schematic designator R)
R104 "49,9 Ом, 1%" R0603 23.85,136.8 r90 top (schematic designator R)
R105 "49,9 Ом, 1%" R0603 25.75,146.8 r270 top (schematic designator R)
R106 "49,9 Ом, 1%" R0603 25.75,149.9 r90 top (schematic designator R)
R107 "49,9 Ом, 1%" R0603 28.45,155.8 r90 top (schematic designator R)
R108 "49,9 Ом, 1%" R0603 28.45,152.7 r270 top (schematic designator R)
R109 "49,9 Ом, 1%" R0603 132.05,152.2 r90 top (schematic designator R)
R110 "49,9 Ом, 1%" R0603 132.05,149.1 r270 top (schematic designator R)
R111 "49,9 Ом, 1%" R0603 132.077,159.575 r90 top (schematic designator R)
R112 "49,9 Ом, 1%" R0603 132.075,156.475 r270 top (schematic designator R)
R113 "49,9 Ом, 1%" R0603 132.05,141.1 r270 bottom (schematic designator R)
R114 "49,9 Ом, 1%" R0603 132.051,144.2 r90 bottom (schematic designator R)
R115 "49,9 Ом, 1%" R0603 132.051,135.7 r90 top (schematic designator R)
R116 "49,9 Ом, 1%" R0603 132.05,132.6 r270 top (schematic designator R)
R117 "49,9 Ом, 1%" R0603 130.95,119.2 r270 top (schematic designator R)
R118 "49,9 Ом, 1%" R0603 130.951,122.3 r90 top (schematic designator R)
R119 "49,9 Ом, 1%" R0603 130.95,111 r270 bottom (schematic designator R)
R120 "49,9 Ом, 1%" R0603 130.951,114.1 r90 bottom (schematic designator R)
R121 "49,9 Ом, 1%" R0603 129.65,98 r90 top (schematic designator R)
R122 "49,9 Ом, 1%" R0603 129.65,94.9 r270 top (schematic designator R)
R123 "49,9 Ом, 1%" R0603 132.45,92.2 r90 top (schematic designator R)
R124 "49,9 Ом, 1%" R0603 132.45,89.1 r270 top (schematic designator R)
R125 "49,9 Ом, 1%" R0603 21.75,185.8 r90 top (schematic designator R)
R126 "49,9 Ом, 1%" R0603 21.75,182.7 r270 top (schematic designator R)
R127 "49,9 Ом, 1%" R0603 24.15,176.8 r270 top (schematic designator R)
R128 "49,9 Ом, 1%" R0603 24.15,179.9 r90 top (schematic designator R)
R129 "49,9 Ом, 1%" R0603 18.504,189.417 r225 top (schematic designator R)
R130 "49,9 Ом, 1%" R0603 20.696,191.609 r45 top (schematic designator R)
R131 "49,9 Ом, 1%" R0603 27.576,191.799 r45 top (schematic designator R)
R132 "49,9 Ом, 1%" R0603 25.384,189.607 r225 top (schematic designator R)
R133 "49,9 Ом, 1%" R0603 52.85,194.6 r0 top (schematic designator R)
R134 "49,9 Ом, 1%" R0603 49.75,194.601 r180 top (schematic designator R)
R135 "49,9 Ом, 1%" R0603 42.65,191.6 r180 top (schematic designator R)
R136 "49,9 Ом, 1%" R0603 45.75,191.6 r0 top (schematic designator R)
R137 "49,9 Ом, 1%" R0603 57,193.6 r180 top (schematic designator R)
R138 "49,9 Ом, 1%" R0603 60.1,193.6 r0 top (schematic designator R)
R139 "49,9 Ом, 1%" R0603 66.35,191.196 r0 top (schematic designator R)
R140 "49,9 Ом, 1%" R0603 63.25,191.2 r180 top (schematic designator R)
R141 "360 Ом" R0603 70.4,192.3 r0 bottom (schematic designator R)
R142 "360 Ом" R0603 138.988,84.415 r90 bottom (schematic designator R)
R143 "360 Ом" R0603 70.4,194.3 r0 bottom (schematic designator R)
R144 "360 Ом" R0603 137.1,84.4 r90 bottom (schematic designator R)
R145 "360 Ом" R0603 38.1,194.9 r180 bottom (schematic designator R)
R146 "360 Ом" R0603 130.7,106.3 r90 top (schematic designator R)
R147 "360 Ом" R0603 38.1,193 r180 bottom (schematic designator R)
R148 "360 Ом" R0603 132.7,106.3 r90 top (schematic designator R)
R149 "360 Ом" R0603 23.7,194.4 r270 bottom (schematic designator R)
R150 "360 Ом" R0603 131.4,127.2 r90 bottom (schematic designator R)
R151 "360 Ом" R0603 25.6,194.4 r270 bottom (schematic designator R)
R152 "360 Ом" R0603 133.3,127.2 r90 bottom (schematic designator R)
R153 "360 Ом" R0603 21.6,172.4 r270 bottom (schematic designator R)
R154 "360 Ом" R0603 129,163.5 r0 bottom (schematic designator R)
R155 "360 Ом" R0603 23.5,172.4 r270 bottom (schematic designator R)
R156 "360 Ом" R0603 129,161.7 r0 bottom (schematic designator R)
R157 "360 Ом" R0603 22.4,156.6 r0 bottom (schematic designator R)
R158 "360 Ом" R0603 129,171.5 r0 bottom (schematic designator R)
R159 "360 Ом" R0603 22.4,158.6 r0 bottom (schematic designator R)
R160 "360 Ом" R0603 129,169.6 r0 bottom (schematic designator R)
R161 "360 Ом" R0603 21.2,129.5 r270 bottom (schematic designator R)
R162 "360 Ом" R0603 123.5,191.7 r90 bottom (schematic designator R)
R163 "360 Ом" R0603 23.1,129.5 r270 bottom (schematic designator R)
R164 "360 Ом" R0603 125.4,191.7 r90 bottom (schematic designator R)
R165 "360 Ом" R0603 21.3,110.3 r90 bottom (schematic designator R)
R166 "360 Ом" R0603 114.4,192.1 r90 bottom (schematic designator R)
R167 "360 Ом" R0603 21.3,114.7 r270 bottom (schematic designator R)
R168 "360 Ом" R0603 116.3,192.1 r90 bottom (schematic designator R)
R169 "360 Ом" R0603 19.8,80.8 r0 bottom (schematic designator R)
R170 "360 Ом" R0603 93.2,191.5 r90 bottom (schematic designator R)
R171 "360 Ом" R0603 19.8,78.9 r0 bottom (schematic designator R)
R172 "360 Ом" R0603 95.1,191.5 r90 bottom (schematic designator R)
SB1 "BUTTON" "Buttom 2pin" 9.2,39 r90 top (schematic designator SB)
SB2 "Switch" Switch_rocker 11,62.4 r0 top (schematic designator SB)
SB3 "Switch" Switch_rocker 143.75,24.2 r180 top (schematic designator SB)
SB4 "Switch" Switch_rocker 143.75,70.5 r0 top
TP1 "Test point, Keystone, 5001" PLS2-1 78.25,42.7 r90 top (schematic designator TP)
TP2 "Test point, Keystone, 5001" PLS2-1 45.75,64.8 r180 top (schematic designator TP)
TP3 "Test point, Keystone, 5001" PLS2-1 91.85,46.6 r135 top (schematic designator TP)
TP4 "Test point, Keystone, 5001" PLS2-1 44.45,69.7 r0 top (schematic designator TP)
TP5 "Test point, Keystone, 5001" PLS2-1 76.8,27.7 r270 top (schematic designator TP)
TP6 "Test point, Keystone, 5001" PLS2-1 76.8,25.7 r270 top (schematic designator TP)
TP7 "Test point, Keystone, 5001" PLS-1 73.05,125.3 r0 top (schematic designator TP5)
TP8 "Test point, Keystone, 5001" PLS-1 71.35,63.2 r0 top (schematic designator TP6)
VD1 "BAT60JFILM (SOD323)" SOD323 90.5,10 r0 top (schematic designator VD)
VD2 "LED" LED_0805 90,16.8 r270 top (schematic designator VD)
VD3 "M2" DO-214AC 131.8,44.6 r90 top (schematic designator VD)
VD4 "M2" DO-214AC 72.9,86.3 r180 top (schematic designator VD)
VT1 "MJD45H11T4G" DPAK 125.34,41.73 r270 top (schematic designator VT)
VT2 "MJD45H11T4G" DPAK 73.12,79.71 r0 top (schematic designator VT)
X1 "PLD8-2,54" PLD8-2,54 82.54,6.89 r180 top (schematic designator X)
X2 "RJ45(100BASE-TX)" RJ-45(LPJ1004AGNL) 96.345,196.6 r180 top (schematic designator X)
X3 "RJ45(100BASE-TX)" RJ-45(LPJ1004AGNL) 118.225,196.6 r180 top (schematic designator X)
X4 "RJ45(100BASE-TX)" RJ-45(LPJ1004AGNL) 140.105,196.6 r180 top (schematic designator X)
X5 "RJ45(100BASE-TX)" RJ-45(LPJ1004AGNL) 134.35,170.925 r90 top (schematic designator X)
X6 "RJ45(100BASE-TX)" RJ-45(LPJ1004AGNL) 19.95,98.7 r270 top (schematic designator X)
X7 "RJ45(100BASE-TX)" RJ-45(LPJ1004AGNL) 19.95,120.475 r270 top (schematic designator X)
X8 "RJ45(100BASE-TX)" RJ-45(LPJ1004AGNL) 19.95,142.175 r270 top (schematic designator X)
X9 "RJ45(100BASE-TX)" RJ-45(LPJ1004AGNL) 19.95,163.875 r270 top (schematic designator X)
X10 "RJ45(100BASE-TX)" RJ-45(LPJ1004AGNL) 134.35,149.325 r90 top (schematic designator X)
X11 "RJ45(100BASE-TX)" RJ-45(LPJ1004AGNL) 134.35,127.625 r90 top (schematic designator X)
X12 "RJ45(100BASE-TX)" RJ-45(LPJ1004AGNL) 134.35,105.925 r90 top (schematic designator X)
X13 "RJ45(100BASE-TX)" RJ-45(LPJ1004AGNL) 134.35,84.125 r90 top (schematic designator X)
X14 "RJ45(100BASE-TX)" RJ-45(LPJ1004AGNL) 19.95,185.575 r270 top (schematic designator X)
X15 "RJ45(100BASE-TX)" RJ-45(LPJ1004AGNL) 30.93,196.6 r180 top (schematic designator X)
X16 "RJ45(100BASE-TX)" RJ-45(LPJ1004AGNL) 52.65,196.6 r180 top (schematic designator X)
X17 "RJ45(100BASE-TX)" RJ-45(LPJ1004AGNL) 74.425,196.6 r180 top (schematic designator X)
XS1 "PLD-24" PLD24_pitch_2.0mm 28.6,13.3 r180 top (schematic designator XS)
XS2 "Banana" Banana_Connect 111.7,8.5 r0 top (schematic designator XS)
XS3 "Banana" Banana_Connect 25.15,69.25 r270 top (schematic designator XS)
XS4 "Banana" Banana_Connect 111.9,28.5 r0 top (schematic designator XS)
XS5 "Banana" Banana_Connect 125.85,76.3 r270 top
ZQ1 "25 MHz" XTAL_HC-49SM 29.15,27.4 r90 top (schematic designator ZQ)

## Footprints (in the part's own frame and the unit in brackets; to place one, negate y for a bottom-side part, rotate by r counter-clockwise, add the part's x,y. Pads: shape width x height; smd on the part's side, far side on the other; paste and mask are expansions set on the pad)
Banana_Connect [mm]
  round 10.2 hole 5: 1(0,0) 2(19.05,0)
  body extent -5.65,-5.65 24.7,5.65, height 8.3
"Buttom 2pin" [mm] "3x6x2.5 (IT-1181A)"
  rect 2x1.5 smd: 1(-4,0) 2(4,0)
  silkscreen extent -4,-2 4,2, body extent -4,-1.8 4,1.8, height 2.6
C0603 [mm]
  rect 0.9x1 smd: 1(-0.8,0) 2(0.8,0)
  silkscreen extent -1.55,-0.8 1.55,0.8, body extent -0.8,-0.4 0.8,0.4, height 0.7
C0805 [mm]
  rect 1x1.45 smd: 1(-0.95,0) 2(0.95,0)
  silkscreen extent -1.75,-1.03 1.75,1.03, body extent -1,-0.63 1,0.63, height 0.85
C_alumin_8x10mm [mm] "Aluminum Electrolytic Capacitor, Body 8.30x8.30x5.40mm, IPC Low Density"
  rect 3.75x1.95 smd: 1(-3.35,0) 2(3.35,0)
  silkscreen extent -4.15,-4.15 4.15,4.15, body extent -4.85,-4.25 4.85,4.25, height 10.3
C_alumin_D=4mm [mm] "Aluminum Electrolytic Capacitor, Body 8.30x8.30x5.40mm, IPC Low Density"
  rect 2.5x1.6 smd: 1(-1.75,0) 2(1.75,0)
  silkscreen extent -2.3,-2.3 2.3,2.3, body extent -2.5,-2.15 2.5,2.15, height 5.4
C_alumin_D=6.3mm [mm] "Aluminum Electrolytic Capacitor, Body 8.30x8.30x5.40mm, IPC Low Density"
  rect 3x1.2 smd: 1(-2.5,0) 2(2.5,0)
  silkscreen extent -3.3,-3.3 3.3,3.3, body extent -3.55,-3.3 3.45,3.3, height 3.91
CD43_Inductor [mm]
  rect 2x4.5 smd: 1(-1.7,0) 2(1.7,0)
  silkscreen extent -3.01,-2.55 3.01,2.55, body extent -2.25,-2 2.25,2, height 3.22
DO-214AC [mm]
  rect 1.55x1.67 smd: 1(1.965,0)
  rrect50% 1.55x1.67 smd: 2(-1.965,0)
  silkscreen extent -2.25,-1.4 2.25,1.4, body extent -2.6,-1.3 2.6,1.3, height 2.4
DPAK [mm] "D-PAK, 3-Pads, Body 6.20x6.72mm (max), IPC Medium Density"
  rect 3x1.6 smd: 1(-5.27,2.29) 2(-5.27,-2.29)
  rect 6.2x5.8 smd: 3(1.9,0)
  silkscreen extent -6.86,-3.35 -1.6,4.19, body extent -5.27,-3.27 4.67,3.27, height 2.34
LED_0805 [mm]
  rect 1.05x1.3 smd: 1(0,0) 2(2.4,0)
  silkscreen extent -0.8,-0.9 3.2,0.9, body extent 0.2,-0.62 2.2,0.63, height 1.1
PLD8-2,54 [mm]
  rect 1.8x1.8 hole 1: 1(0,-0.01)
  round 1.8 hole 1: 2(0,2.53) 3(2.54,-0.01) 4(2.54,2.53) 5(5.08,-0.01) 6(5.08,2.53) 7(7.62,-0.01) 8(7.62,2.53)
  silkscreen extent -1.27,-1.28 8.89,3.8
PLD24_pitch_2.0mm [mm]
  round 1.5 hole 0.9: 1(0,-2) 2(0,0) 3(2,-2) 4(2,0) 5(4,-2) 6(4,0) 7(6,-2) 8(6,0) 9(8,-2) 10(8,0) 11(10,-2) 12(10,0) 13(12,-2) 14(12,0) 15(14,-2) 16(14,0) 17(16,-2) 18(16,0) 19(18,-2) 20(18,0) 21(20,-2) 22(20,0) 23(22,-2) 24(22,0)
  silkscreen extent -1.75,-3.75 23.75,1.75, body extent -1,-3 23,1, height 2
PLS2-1 [mm]
  oval 1.1x1.3 hole 0.8: 1(0,0)
  silkscreen extent -1,-1 1,1, body extent -1,-1 1,1, height 6
PLS-1 [mm]
  round 1.6 hole 1: 1(0,0)
  body extent -1.27,-1.27 1.27,1.27, height 8.54
QFP-128_14x20mm_0.5mm [mm] "SQFP, 128-Leads, Body 14.00x20.00mm, Pitch 0.50mm, IPC Medium Density"
  rect 0.3x1.85 smd: 1(-9.25,-8.1) 2(-8.75,-8.1) 3(-8.25,-8.1) 4(-7.75,-8.1) 5(-7.25,-8.1) 6(-6.75,-8.1) 7(-6.25,-8.1) 8(-5.75,-8.1) 9(-5.25,-8.1) 10(-4.75,-8.1) 11(-4.25,-8.1) 12(-3.75,-8.1) 13(-3.25,-8.1) 14(-2.75,-8.1) 15(-2.25,-8.1) 16(-1.75,-8.1) 17(-1.25,-8.1) 18(-0.75,-8.1) 19(-0.25,-8.1) 20(0.25,-8.1) 21(0.75,-8.1) 22(1.25,-8.1) 23(1.75,-8.1) 24(2.25,-8.1) 25(2.75,-8.1) 26(3.25,-8.1) 27(3.75,-8.1) 28(4.25,-8.1) 29(4.75,-8.1) 30(5.25,-8.1) 31(5.75,-8.1) 32(6.25,-8.1) 33(6.75,-8.1) 34(7.25,-8.1) 35(7.75,-8.1) 36(8.25,-8.1) 37(8.75,-8.1) 38(9.25,-8.1) 65(9.25,8.1) 66(8.75,8.1) 67(8.25,8.1) 68(7.75,8.1) 69(7.25,8.1) 70(6.75,8.1) 71(6.25,8.1) 72(5.75,8.1) 73(5.25,8.1) 74(4.75,8.1) 75(4.25,8.1) 76(3.75,8.1) 77(3.25,8.1) 78(2.75,8.1) 79(2.25,8.1) 80(1.75,8.1) 81(1.25,8.1) 82(0.75,8.1) 83(0.25,8.1) 84(-0.25,8.1) 85(-0.75,8.1) 86(-1.25,8.1) 87(-1.75,8.1) 88(-2.25,8.1) 89(-2.75,8.1) 90(-3.25,8.1) 91(-3.75,8.1) 92(-4.25,8.1) 93(-4.75,8.1) 94(-5.25,8.1) 95(-5.75,8.1) 96(-6.25,8.1) 97(-6.75,8.1) 98(-7.25,8.1) 99(-7.75,8.1) 100(-8.25,8.1) 101(-8.75,8.1) 102(-9.25,8.1)
  rect 1.85x0.3 smd: 39(11.1,-6.25) 40(11.1,-5.75) 41(11.1,-5.25) 42(11.1,-4.75) 43(11.1,-4.25) 44(11.1,-3.75) 45(11.1,-3.25) 46(11.1,-2.75) 47(11.1,-2.25) 48(11.1,-1.75) 49(11.1,-1.25) 50(11.1,-0.75) 51(11.1,-0.25) 52(11.1,0.25) 53(11.1,0.75) 54(11.1,1.25) 55(11.1,1.75) 56(11.1,2.25) 57(11.1,2.75) 58(11.1,3.25) 59(11.1,3.75) 60(11.1,4.25) 61(11.1,4.75) 62(11.1,5.25) 63(11.1,5.75) 64(11.1,6.25) 103(-11.1,6.25) 104(-11.1,5.75) 105(-11.1,5.25) 106(-11.1,4.75) 107(-11.1,4.25) 108(-11.1,3.75) 109(-11.1,3.25) 110(-11.1,2.75) 111(-11.1,2.25) 112(-11.1,1.75) 113(-11.1,1.25) 114(-11.1,0.75) 115(-11.1,0.25) 116(-11.1,-0.25) 117(-11.1,-0.75) 118(-11.1,-1.25) 119(-11.1,-1.75) 120(-11.1,-2.25) 121(-11.1,-2.75) 122(-11.1,-3.25) 123(-11.1,-3.75) 124(-11.1,-4.25) 125(-11.1,-4.75) 126(-11.1,-5.25) 127(-11.1,-5.75) 128(-11.1,-6.25)
  silkscreen extent -10.08,-8.22 9.77,6.78, body extent -11.6,-8.6 11.6,8.6, height 3.4
QFP-128_(14x20mm)_0.5mm_ZIF [mm]
  round 1 hole 0.6: 1(0,0.02) 2(2.55,-0.575) 3(5.1,-1.175) 4(0,-1.47) 5(2.55,-2.065) 6(5.1,-2.665) 7(0,-2.96) 8(2.55,-3.555) 9(5.1,-4.155) 10(0,-4.45) 11(2.55,-5.045) 12(5.1,-5.645) 13(0,-5.94) 14(2.55,-6.535) 15(5.1,-7.135) 16(0.01,-7.43) 17(2.56,-8.025) 18(5.11,-8.625) 19(0.01,-8.92) 20(2.56,-9.515) 21(5.11,-10.115) 22(0.01,-10.41) 23(2.56,-11.005) 24(5.11,-11.605) 25(0,-11.9) 26(2.55,-12.495) 27(5.1,-13.095) 28(0,-13.39) 29(2.55,-13.985) 30(5.1,-14.585) 31(0,-14.88) 32(2.55,-15.475) 33(5.1,-16.075) 34(0,-16.37) 35(2.55,-16.965) 36(5.1,-17.565) 37(0,-17.86) 38(2.55,-18.455) 39(7.485,-20.76) 40(8.08,-18.21) 41(8.675,-15.675) 42(8.975,-20.75) 43(9.57,-18.2) 44(10.165,-15.665) 45(10.465,-20.75) 46(11.06,-18.2) 47(11.655,-15.665) 48(11.955,-20.75) 49(12.55,-18.2) 50(13.145,-15.665) 51(13.445,-20.76) 52(14.04,-18.21) 53(14.635,-15.675) 54(14.935,-20.76) 55(15.53,-18.21) 56(16.125,-15.675) 57(16.425,-20.76) 58(17.02,-18.21) 59(17.615,-15.675) 60(17.915,-20.76) 61(18.51,-18.21) 62(19.105,-15.675) 63(19.405,-20.76) 64(20,-18.21) 65(27.6,-18.56) 66(25.05,-17.965) 67(22.5,-17.375) 68(27.6,-17.07) 69(25.05,-16.475) 70(22.5,-15.885) 71(27.6,-15.58) 72(25.05,-14.985) 73(22.5,-14.395) 74(27.6,-14.09) 75(25.05,-13.495) 76(22.5,-12.905) 77(27.6,-12.6) 78(25.05,-12.005) 79(22.5,-11.415) 80(27.59,-11.11) 81(25.04,-10.515) 82(22.49,-9.925) 83(27.59,-9.62) 84(25.04,-9.025) 85(22.49,-8.435) 86(27.59,-8.13) 87(25.04,-7.535) 88(22.49,-6.945) 89(27.6,-6.64) 90(25.05,-6.045) 91(22.5,-5.455) 92(27.6,-5.15) 93(25.05,-4.555) 94(22.5,-3.965) 95(27.6,-3.66) 96(25.05,-3.065) 97(22.5,-2.475) 98(27.6,-2.17) 99(25.05,-1.575) 100(22.5,-0.985) 101(27.6,-0.68) 102(25.05,-0.085) 103(20.115,2.26) 104(19.52,-0.29) 105(18.925,-2.825) 106(18.625,2.25) 107(18.03,-0.3) 108(17.435,-2.835) 109(17.135,2.25) 110(16.54,-0.3) 111(15.945,-2.835) 112(15.645,2.25) 113(15.05,-0.3) 114(14.455,-2.835) 115(14.155,2.26) 116(13.56,-0.29) 117(12.965,-2.825) 118(12.665,2.26) 119(12.07,-0.29) 120(11.475,-2.825) 121(11.175,2.26) 122(10.58,-0.29) 123(9.985,-2.825) 124(9.685,2.26) 125(9.09,-0.29) 126(8.495,-2.825) 127(8.195,2.26) 128(7.6,-0.29)
  silkscreen extent -0.85,-21.99 28.65,3.43
R0603 [mm]
  rect 0.9x1 smd: 1(-0.8,0) 2(0.8,0)
  silkscreen extent -1.55,-0.8 1.55,0.8, body extent -0.8,-0.4 0.8,0.4, height 0.45
RJ-45(LPJ1004AGNL) [mm]
  round 3.3 hole 3.3: 0(2.41,-14.65) 0(13.84,-14.65)
  round 1.5 hole 0.9: 1(12.565,-5.76) 2(11.295,-8.3) 3(10.025,-5.76) 4(8.755,-8.3) 5(7.485,-5.76) 6(6.215,-8.3) 7(4.945,-5.76) 8(3.675,-8.3)
  round 1.6 hole 1.05: 9(13.585,-0.93) 10(11.045,-0.93) 11(5.205,-0.93) 12(2.665,-0.93)
  round 2.2 hole 1.7: 13(0.375,-11.6) 13(15.875,-11.6)
  silkscreen extent 0,-19.4 16.25,0.15, body extent -2,-25.25 18.25,0.15, height 15.72
SOD323 [mm]
  rect 1x0.8 smd: 1(1.2,0)
  rrect50% 1x0.8 smd: 2(-1.2,0)
  silkscreen extent -0.9,-0.84 0.9,0.84
SOIC-8 [mm] "SOIC, 8-Leads, Body 3.90x3.90mm, Pitch 1.27mm, IPC Medium Density"
  oval 1.45x0.6 smd: 1(-2.725,1.905) 2(-2.725,0.635) 3(-2.725,-0.635) 4(-2.725,-1.905) 5(2.725,-1.905) 6(2.725,-0.635) 7(2.725,0.635) 8(2.725,1.905)
  silkscreen extent -2.85,-2 1.6,2.88, body extent -3,-2.45 3,2.45, height 1.7
Switch_rocker [mm]
  oval 4x1.5 hole 1 slot 3.5 at 0 deg: 1(0,0) 2(0,-5)
  silkscreen extent -5.25,-7.5 5.25,7.5, body extent -5.25,-7.5 5.25,7.5, height 13.6
"TECAP_type C" [mm]
  rect 2.7x2.8 smd: 1(0,0) 2(5.9,0)
  silkscreen extent -2.1,-1.93 7.6,1.9, body extent -0.17,-1.58 6.02,1.63, height 2.72
XTAL_HC-49SM [mm]
  rect 5x1.6 smd: 1(0,0) 2(12.1,0)
  silkscreen extent 0.2,-2.5 12,2.5, body extent -0.85,-2.5 13.05,2.5, height 4.5

## Part data
C1 C6 C27: library part T_Cap_SMD
C2 C3 C7 C8 C9 C10 C11 C12 C14 C15 C16 C17 C18 C19 C20 C21 C22 C25 C26 C28 C29 C30 C31 C32 C33 C34 C35 C36 C37 C38 C39 C40 C41 C42 C43 C44 C45 C46 C47 C48 C49 C50 C51 C52 C53 C54 C55 C56 C57 C58 C59 C60 C61 C62 C63 C64 C65 C66 C67 C68 C69 C70 C71 C72 C73 C74 C75 C76 C77 C78 C79 C80 C81 C82 C83 C84 C85: library part Capacitance_SMD
C4 C5 C13 C23 C24: library part Cap_Electrolyte
L1 L2 L3: library part Inductance_SMD
R1 R2 R3 R4 R5 R6 R7 R8 R9 R10 R11 R12 R13 R14 R15 R16 R17 R18 R19 R20 R21 R22 R23 R24 R25 R26 R27 R28 R29 R30 R31 R32 R33 R34 R35 R36 R37 R38 R39 R40 R41 R42 R43 R44 R45 R46 R47 R48 R49 R50 R51 R52 R53 R54 R55 R56 R57 R58 R59 R60 R61 R62 R63 R64 R65 R66 R67 R68 R69 R70 R71 R72 R73 R74 R75 R76 R77 R78 R79 R80 R81 R82 R83 R84 R85 R86 R87 R88 R89 R90 R91 R92 R93 R94 R95 R96 R97 R98 R99 R100 R101 R102 R103 R104 R105 R106 R107 R108 R109 R110 R111 R112 R113 R114 R115 R116 R117 R118 R119 R120 R121 R122 R123 R124 R125 R126 R127 R128 R129 R130 R131 R132 R133 R134 R135 R136 R137 R138 R139 R140 R141 R142 R143 R144 R145 R146 R147 R148 R149 R150 R151 R152 R153 R154 R155 R156 R157 R158 R159 R160 R161 R162 R163 R164 R165 R166 R167 R168 R169 R170 R171 R172: library part Resistor_SMD
SB1: "3x6x2.5 / 4.5x6.5"
SB2 SB3 SB4: library part "Switch Rocker", "ON-OFF SPST Switch"
TP1 TP2 TP3 TP4 TP5 TP6 TP7 TP8: library part Connector_Test_Point, Manufacturer=Keystone, PartNumber=5001, HelpURL=https://www.digikey.com/product-detail/en/keystone-electronics/5001/36-5001-ND/255327, TypeConnector="Test point", ValueManufacturerPartNumber="Test point, Keystone, 5001"
VD3 VD4: library part Diode
VT1 VT2: library part PNP
X2 X3 X4 X5 X6 X7 X8 X9 X10 X11 X12 X13 X14 X15 X16 X17: library part "RJ-45 FAST Ethernet"
XS2 XS3 XS4 XS5: "Banana Connectors"
ZQ1: library part XTAL_HC-49S
VD1: ComponentHeigt=0.75, Firme=Kingbright, KIND="Светодиод L-1154GD Kingbright", Leadform="в отверстия", NN=24003000
X1: ComponentHeigt=5.5, Name=Вилка, Specification="Вилка PLD2-2 *", Typ=PLD2-2

## Free pads (board coordinates)
  round 3.5 hole 3.5 unplated: 0(7.9,23.7) 0(7.95,209) 0(74.85,99) 0(74.85,172.1) 0(87.9,23.7) 0(146.95,209) 0(147,8)

## Via types
v1: diameter 0.7, hole 0.4, Top to Bottom, tented both sides, 332 vias
v2: diameter 1.2, hole 0.6, Top to Bottom, tented both sides, 11 vias
v3: diameter 0.9, hole 0.4, Top to Bottom, tented both sides, 2 vias

## Nets (pads, with @x,y where several pads share a name; then routed paths per layer and width w, separated by ;. In a path a pad name is that pad's centre, name@x,y a point inside that pad or via, vN(x,y) a via of type N, cw(c..) or ccw(c..) an arc to the next point about the centre after c; other vN are vias at no path point)
1V8: C24.1 C25.1 C26.1 C70.1 C71.1 C74.1 C75.1 C78.1 C79.1 C82.1 C83.1 DD3.10 DD3.24 DD3.34 DD3.60 DD3.90 DD3.117 DD3.118 DD3.124 DD3.128 VD4.1 X6.4 X6.5 X7.4 X7.5 X8.4 X8.5 X9.4 X9.5 X14.4 X14.5 X15.4 X15.5 X16.4 X16.5 X17.4 X17.5 | length 66
  Top w0.2: v1(43.285,92.199) v1@43.3,92.214 ; v3@59.767,86.75 59.65,86.867 v3(59.65,87) 59.65,87.133 v3@59.767,87.25
  Top w0.3: DD3.60@39.45,81.75 41.4,81.75 44.624,84.974 44.624,87.874 48.3,91.55 DD3.24@48.3,94.1 ; v1@43.3,92.214 DD3.34@43.3,94.1 ; DD3.90@53.8,77.9 53.8,83.2 57.6,87 v3(59.65,87) ; v1(54.05,91.5) 55.3,92.75 DD3.10@55.3,94.1 ; v3@59.767,86.75 DD3.117@61.65,86.75 ; v3@59.767,87.25 DD3.118@61.65,87.25 ; DD3.124@61.65,90.25 63.25,90.25 v1(63.3,90.2) ; DD3.128@61.65,92.25 63.6,92.25 v1(63.625,92.225)
  Bottom w0.2: X6.5@14.19,91.2 X6.5@14.19,91.215
  Bottom w0.4: C83.1@9.05,155.1 11.63,155.1 ccw(c11.63,155.12) X9.4@11.65,155.12 ; C71.1@9.55,111.7 cw(c9.598,111.652) 9.598,111.72 X7.4@11.65,111.72 ; C75.1@9.55,133.4 11.63,133.4 X8.4@11.65,133.42 ; C70.1@9.65,90 9.678,89.972 11.622,89.972 X6.4@11.65,89.945 ; C82.1@9.65,176.8 cw(c9.67,176.8) 9.67,176.82 X14.4@11.65,176.82 ; C78.1@22.15,207.3 22.162,207.288 22.162,204.912 X15.4@22.175,204.9 ; C79.1@43.85,207.4 43.872,207.377 43.872,204.922 X16.4@43.895,204.9 ; C74.1@65.65,207.2 65.66,207.19 65.66,204.91 X17.4@65.67,204.9
  Bottom w0.5: C26.1@40.9,91.9 42.932,91.9 43.231,92.199 v1(43.285,92.199) ; C25.1@61.75,93.5 61.75,93.45 62.937,92.263 63.587,92.263 v1(63.625,92.225)
  other v1: 68.3,85.9 68.3,87.6 68.3,89.6 48.3,91.6
1V8_DUT: C28.1 C29.1 C72.1 C73.1 C76.1 C77.1 C80.1 C81.1 C84.1 C85.1 DD2.10 DD2.24 DD2.34 DD2.60 DD2.90 DD2.117 DD2.118 DD2.124 DD2.128 SB4.1 X2.4 X2.5 X3.4 X3.5 X4.4 X4.5 X5.4 X5.5 X10.4 X10.5 X11.4 X11.5 X12.4 X12.5 X13.4 X13.5 XS5.1 | length 82.1
  Top w0.8: XS5.1@125.819,76.331 XS5.1@125.85,76.3
  Top w1: DD2.124@111.77,83.215 112.935,83.215 119.819,76.331 XS5.1@125.819,76.331
  Top w1.5: XS5.1@125.15,78.4 133.05,70.5 SB4.1@143.75,70.5
  Power w0.4: DD2.90@103.465,67.85 104.365,68.75 109.137,68.75 110.35,69.963 110.35,74
  Power w0.5: 86.15,85.9 86.15,76.4 87.565,74.985 DD2.60@88.75,74.985
  Bottom w0.2: DD2.60@88.75,74.985 DD2.60@88.88,75.115 ; C28.1@97.905,86.345 C28.1@98.15,86.1
  Bottom w0.4: X2.4@87.59,204.9 87.59,207.04 C85.1@87.65,207.1 ; C81.1@109.45,206.9 109.45,204.948 ccw(c109.518,204.948) X3.4@109.47,204.9 ; X4.4@131.35,204.9 C80.1@131.35,207 ; X13.4@142.65,92.88 cw(c142.698,92.832) 142.698,92.9 C77.1@144.75,92.9 ; X12.4@142.65,114.68 cw(c142.698,114.632) 142.698,114.7 C76.1@144.75,114.7 ; X11.4@142.65,136.38 cw(c142.698,136.332) 142.698,136.4 C84.1@144.75,136.4 ; X10.4@142.65,158.08 cw(c142.698,158.032) 142.698,158.1 C73.1@144.75,158.1 ; X5.4@142.65,179.68 cw(c142.698,179.632) 142.698,179.7 C72.1@144.75,179.7
  Bottom w0.6: C28.1@97.905,86.345 DD2.24@97.905,87.79
  other v1: 111.6,88.8
1V8_DUT_IN: C23.1 SB4.2 VD3.1 XS5.2 | length 31.3
  Top w1.5: XS5.2@125.85,57.9 133.45,65.5 SB4.2@143.75,65.5
  Top w2: XS5.2@125.85,57.25 125.85,55.55 131.88,49.52